# Altium PCB PCB1.PcbDoc (part 1 of 3)
Units mil, origin at the board's own origin, x right, y up, seen from the top; angles counter-clockwise.
Board outline 7110 x 5135 mil, 4 copper layers (Top Layer, Layer 1, Layer 2, Bottom Layer), stack 23.756 mil thick; 224 components, 137 nets, 658 pads, 306 vias.
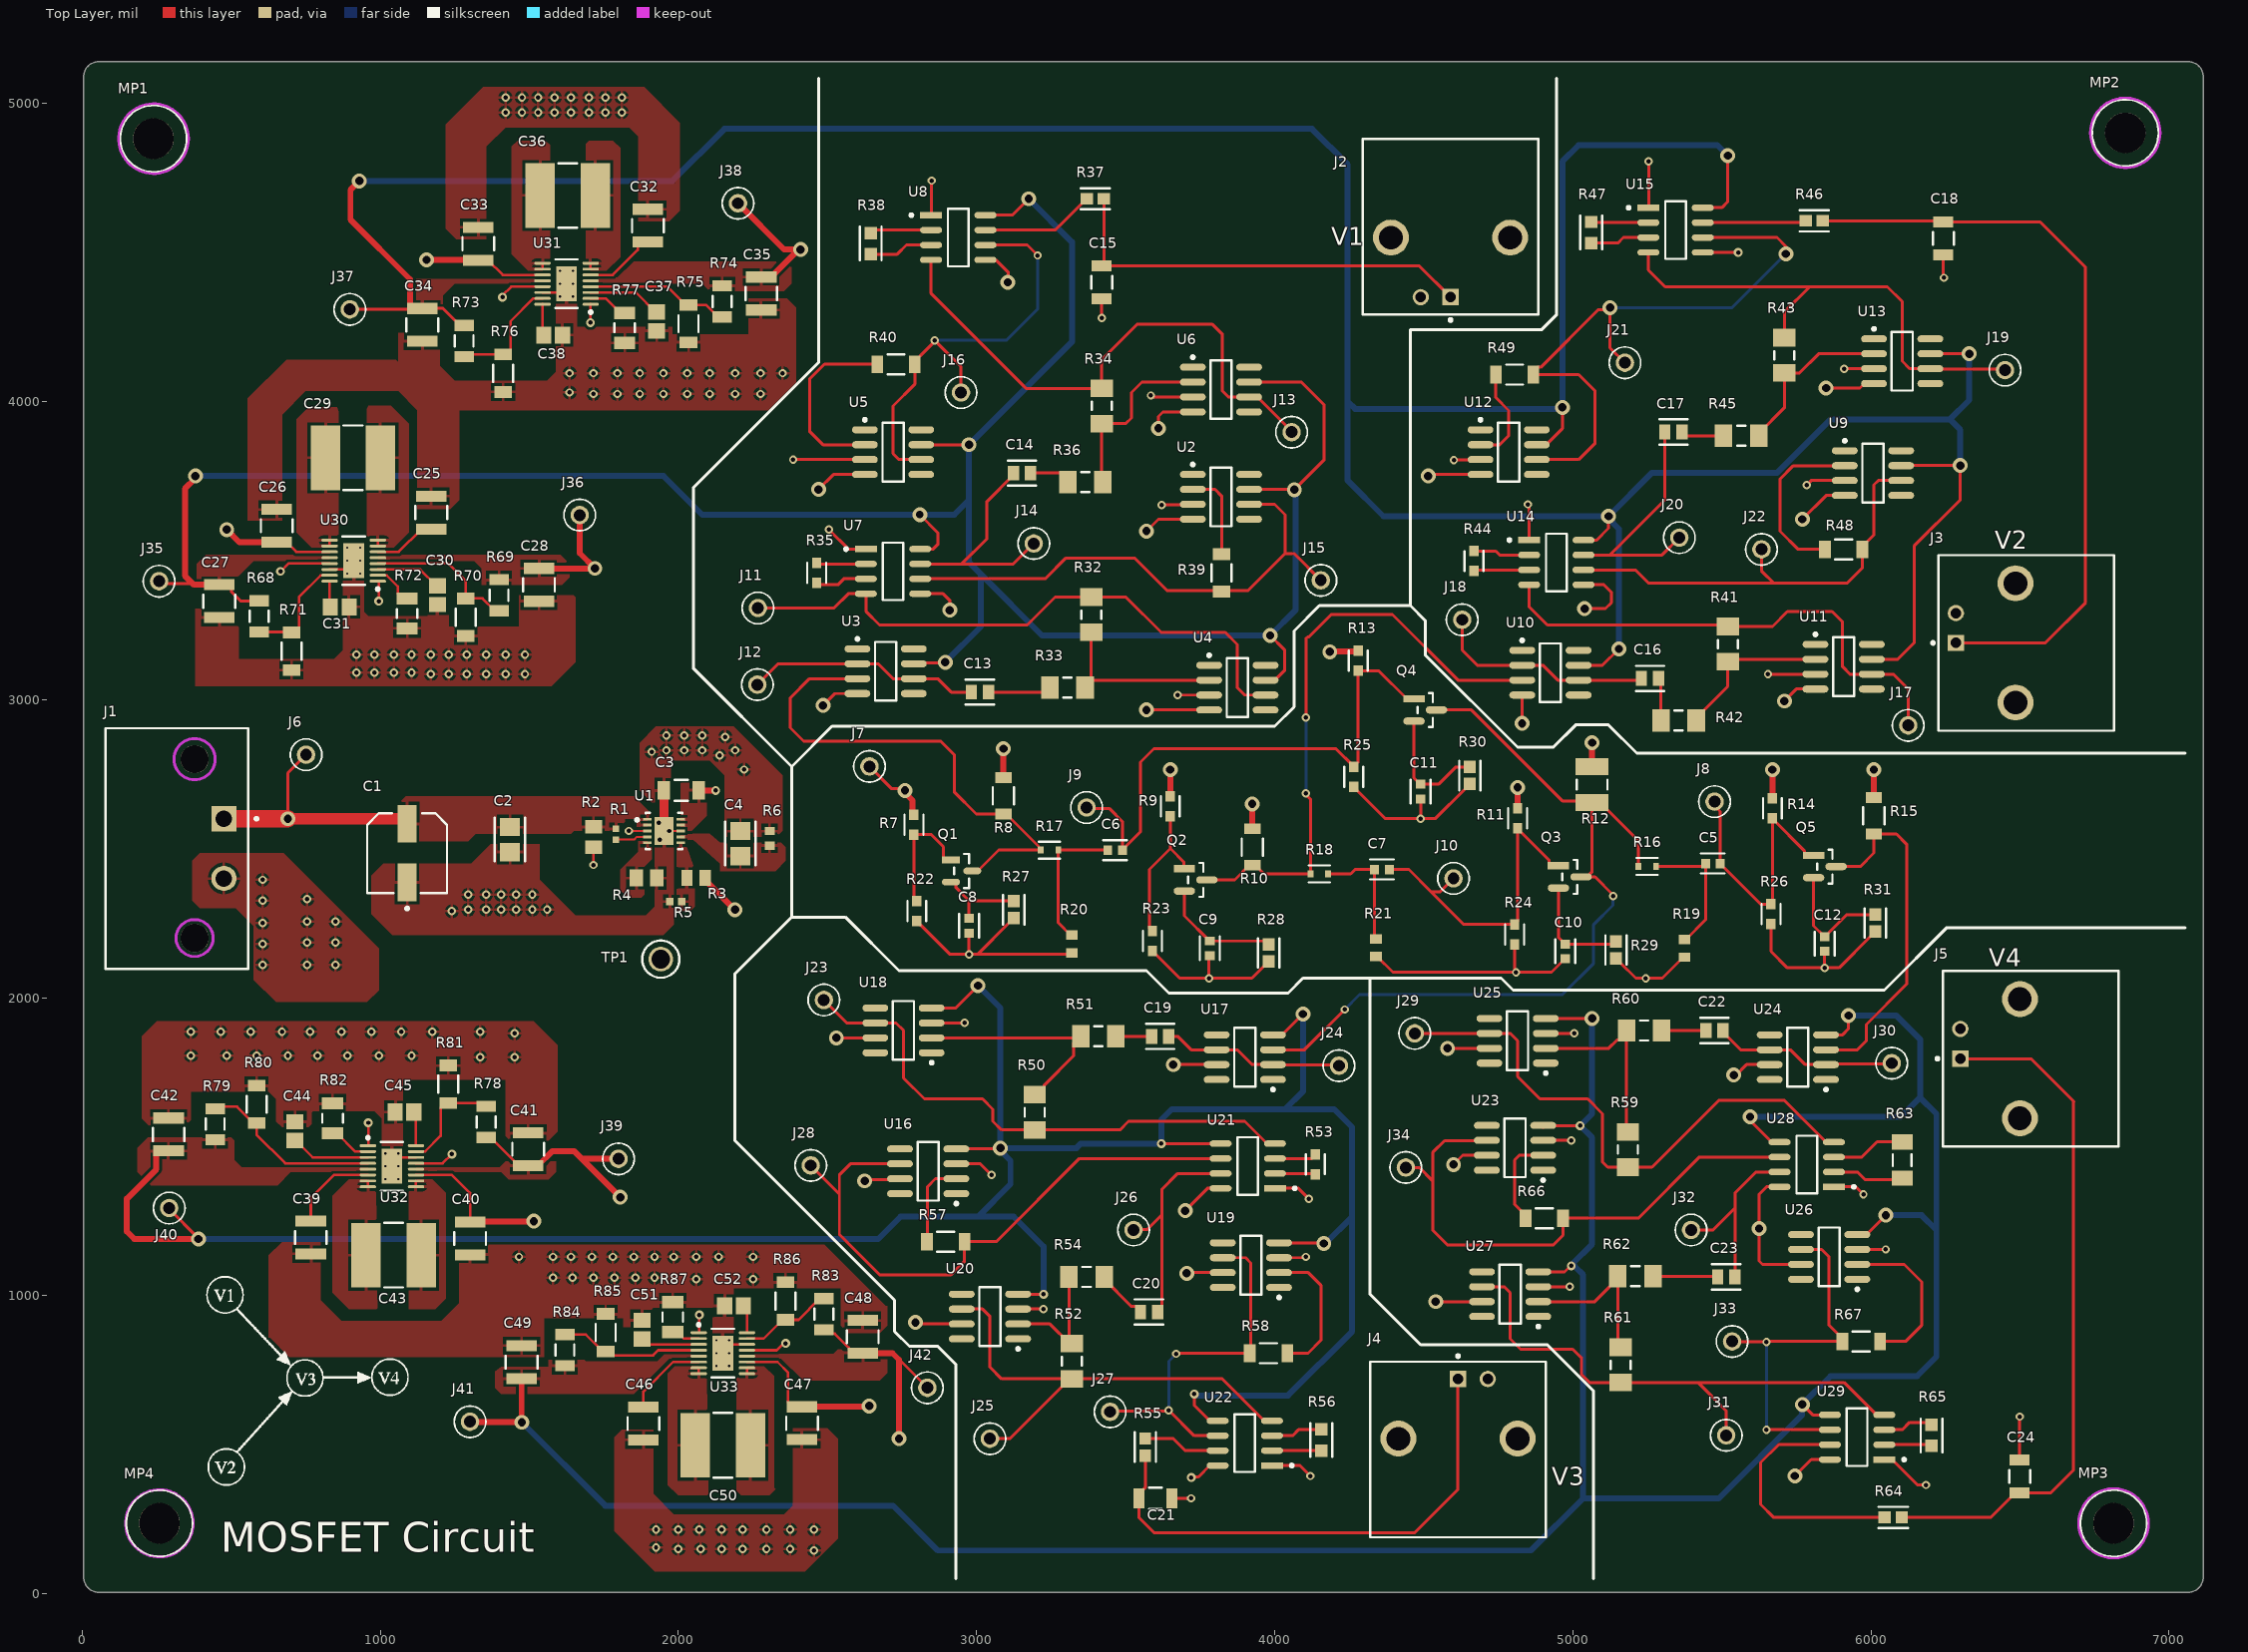
[diagram p0: Top Layer view]
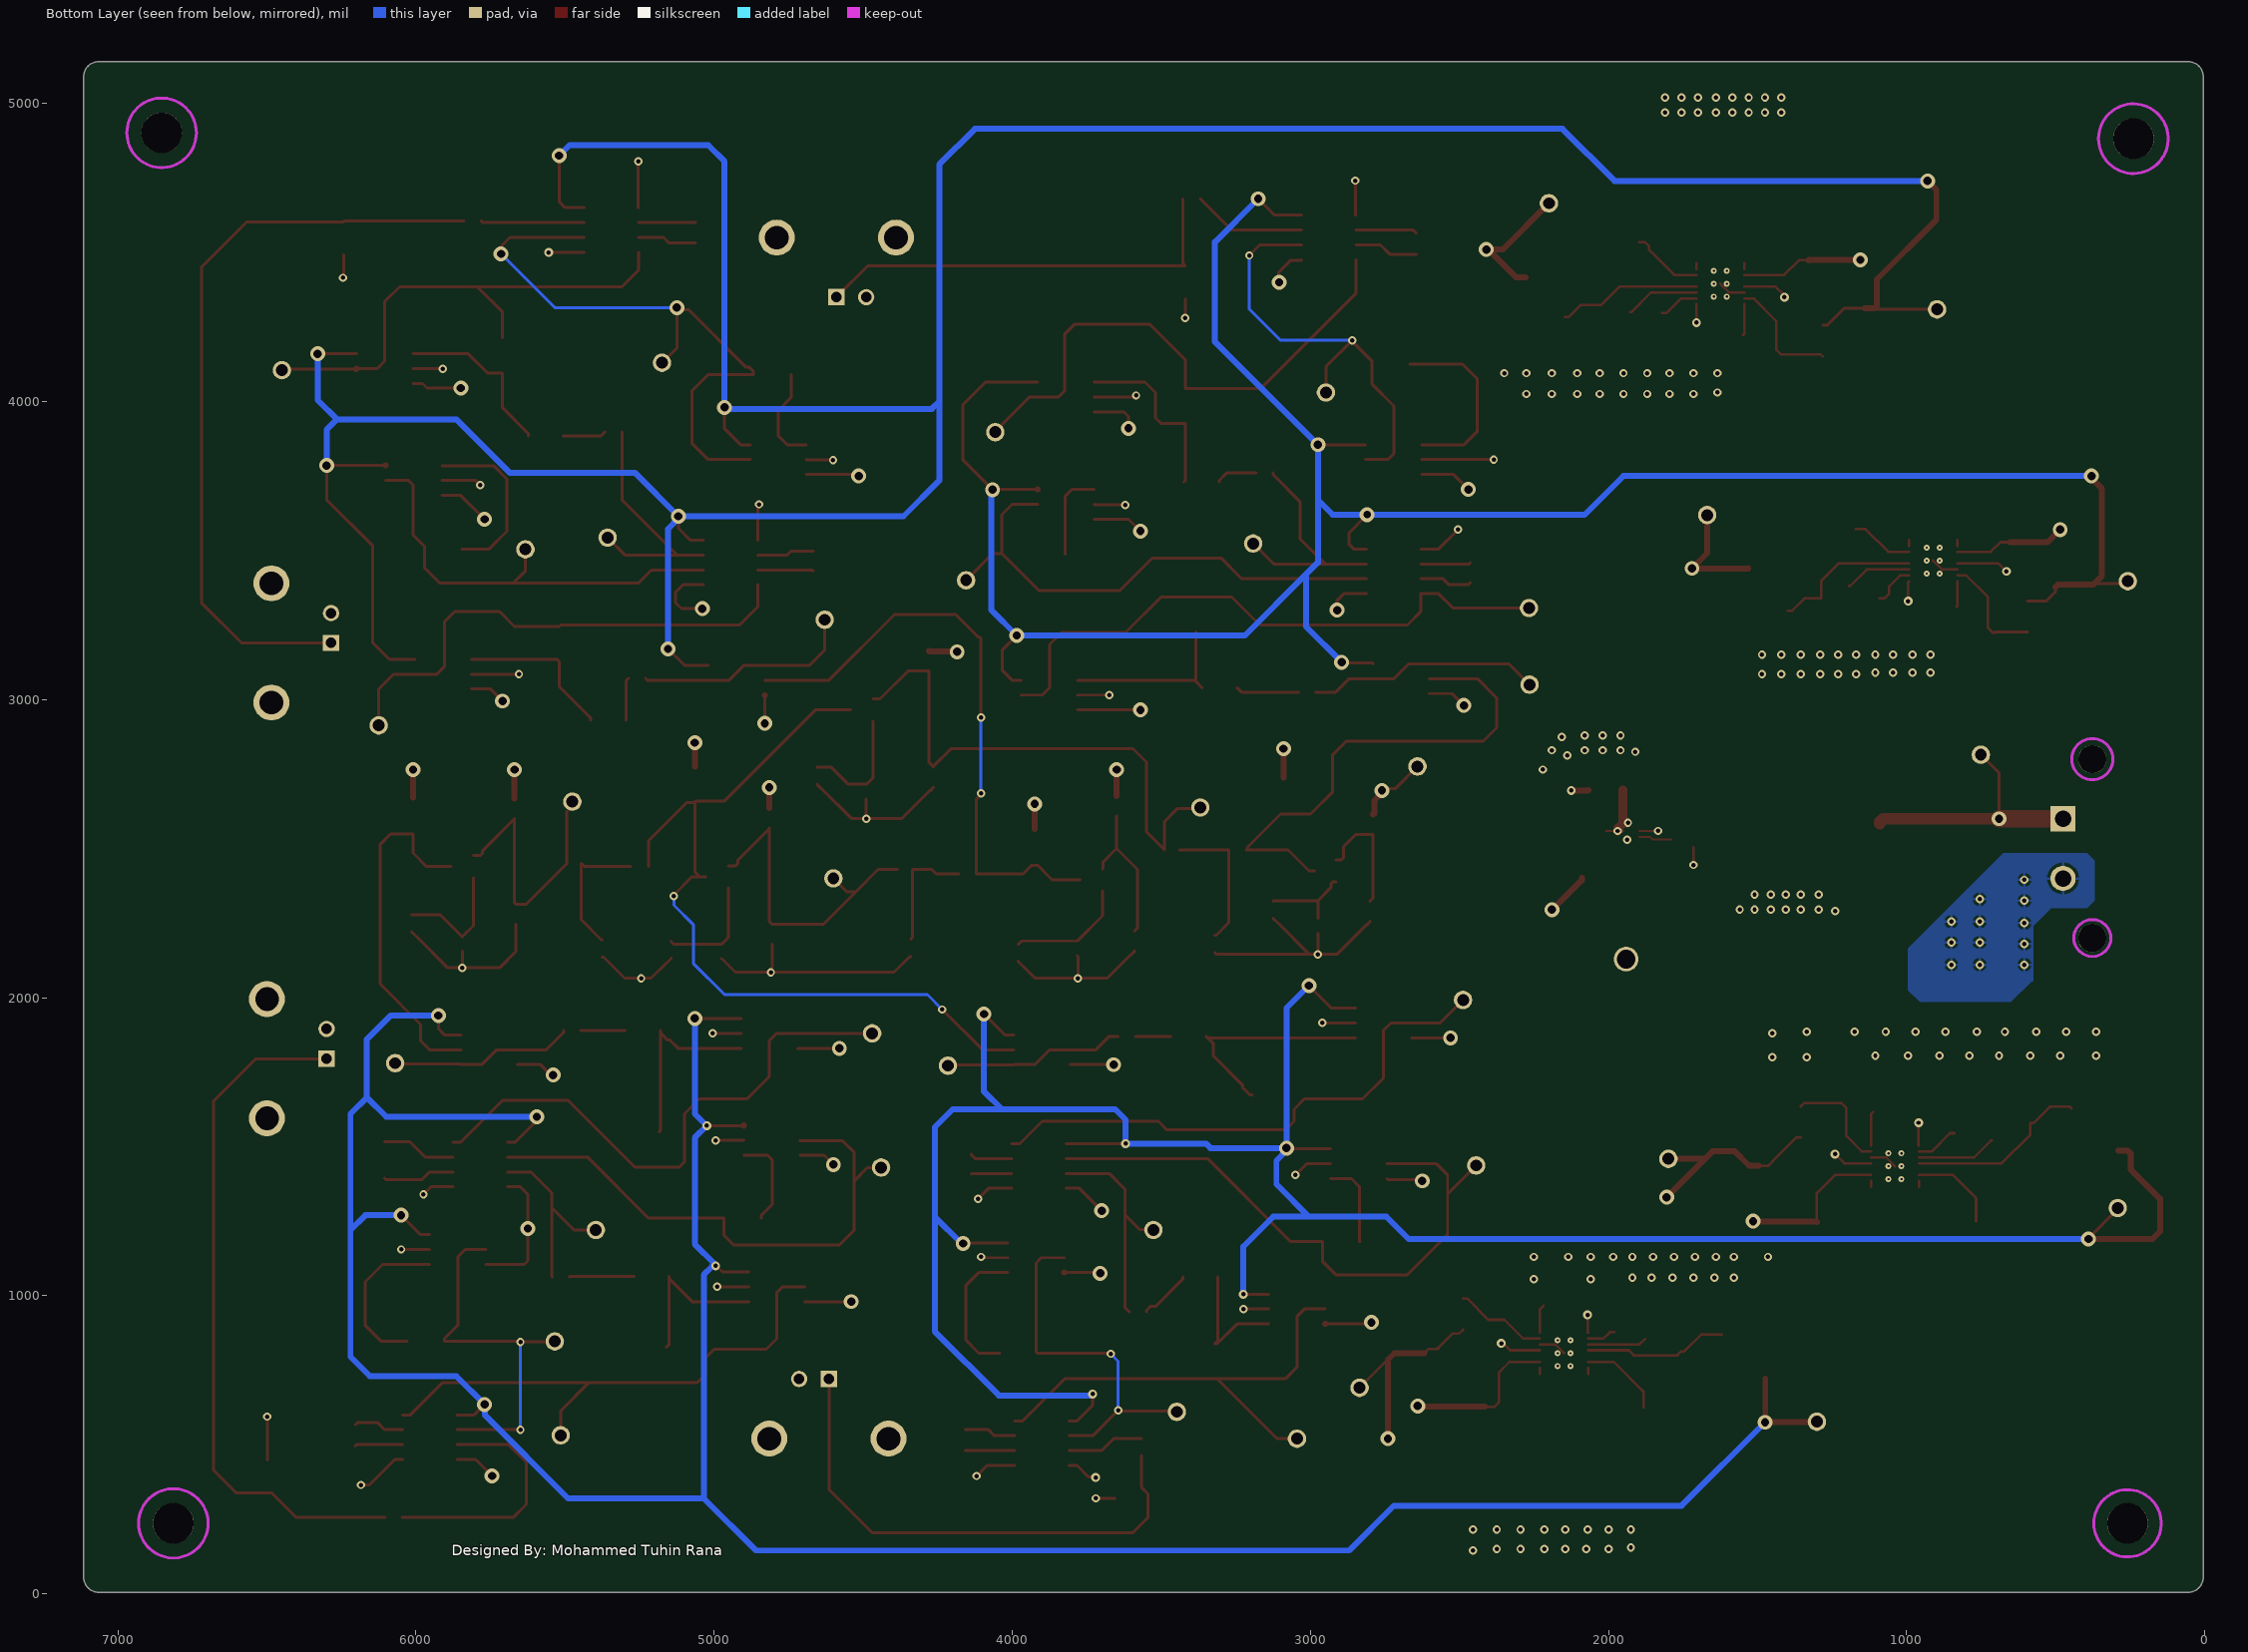
[diagram p1: Bottom Layer view, seen from below]
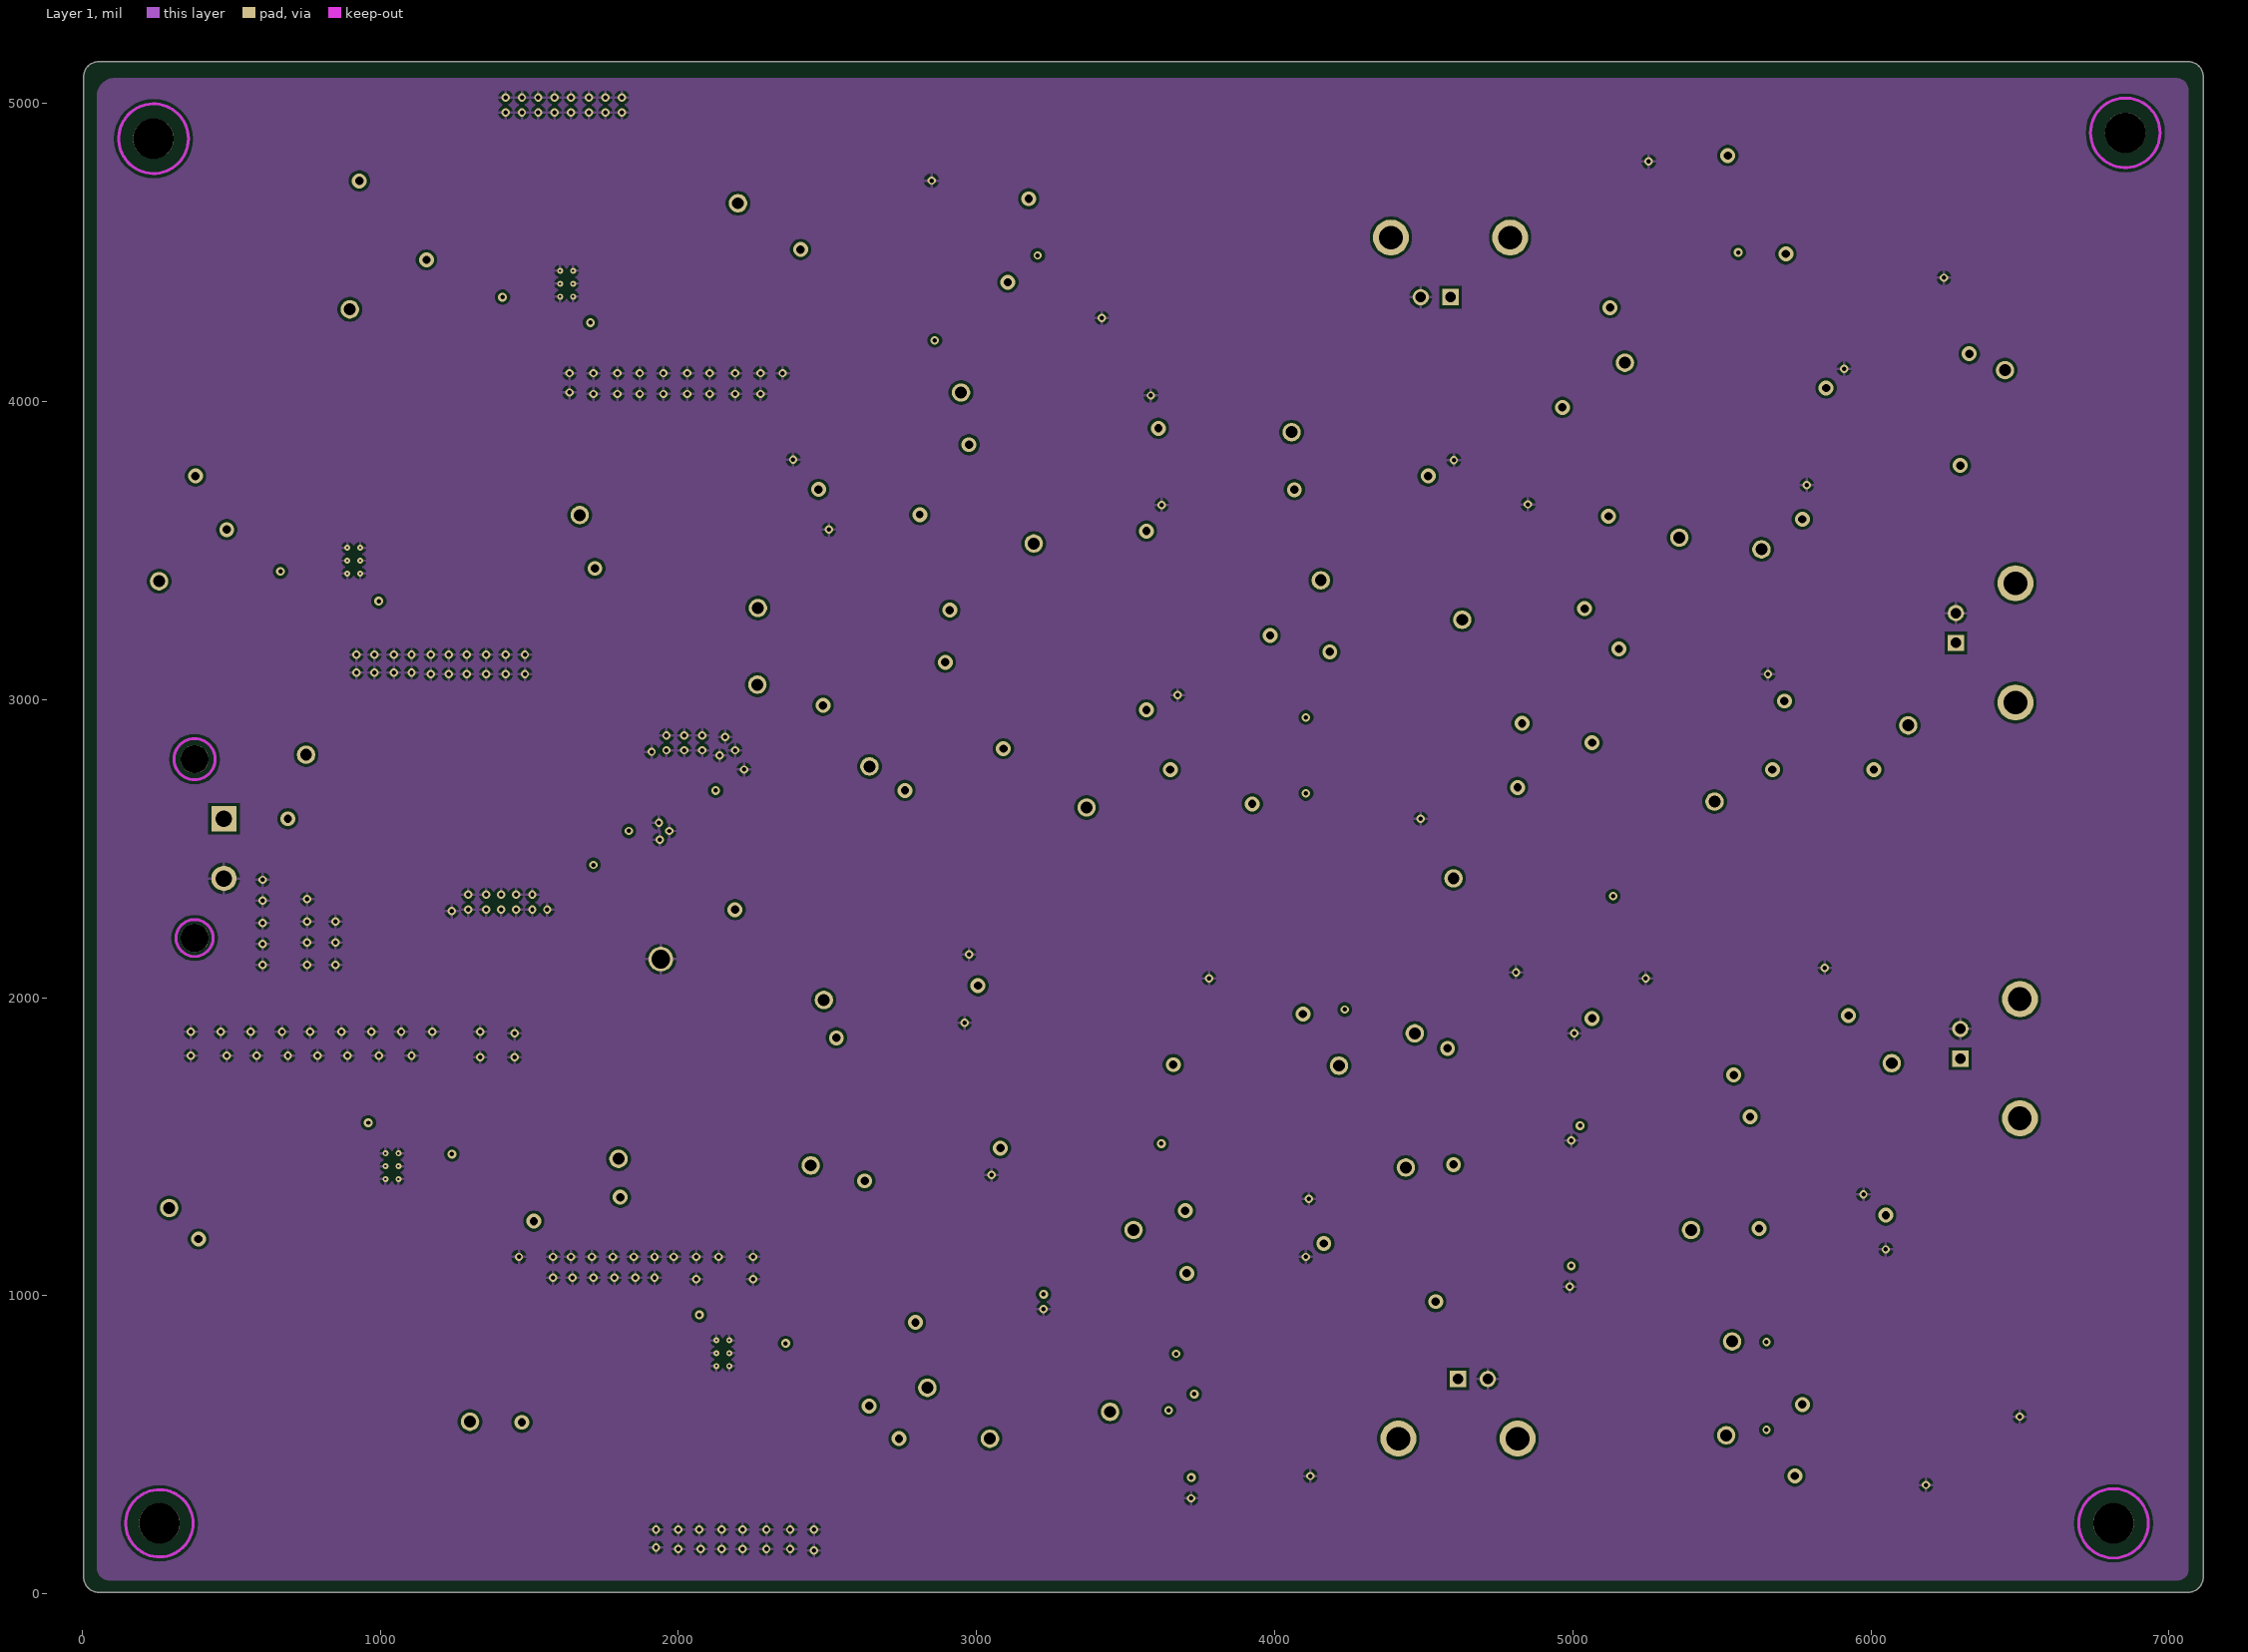
[diagram p2: Layer 1]
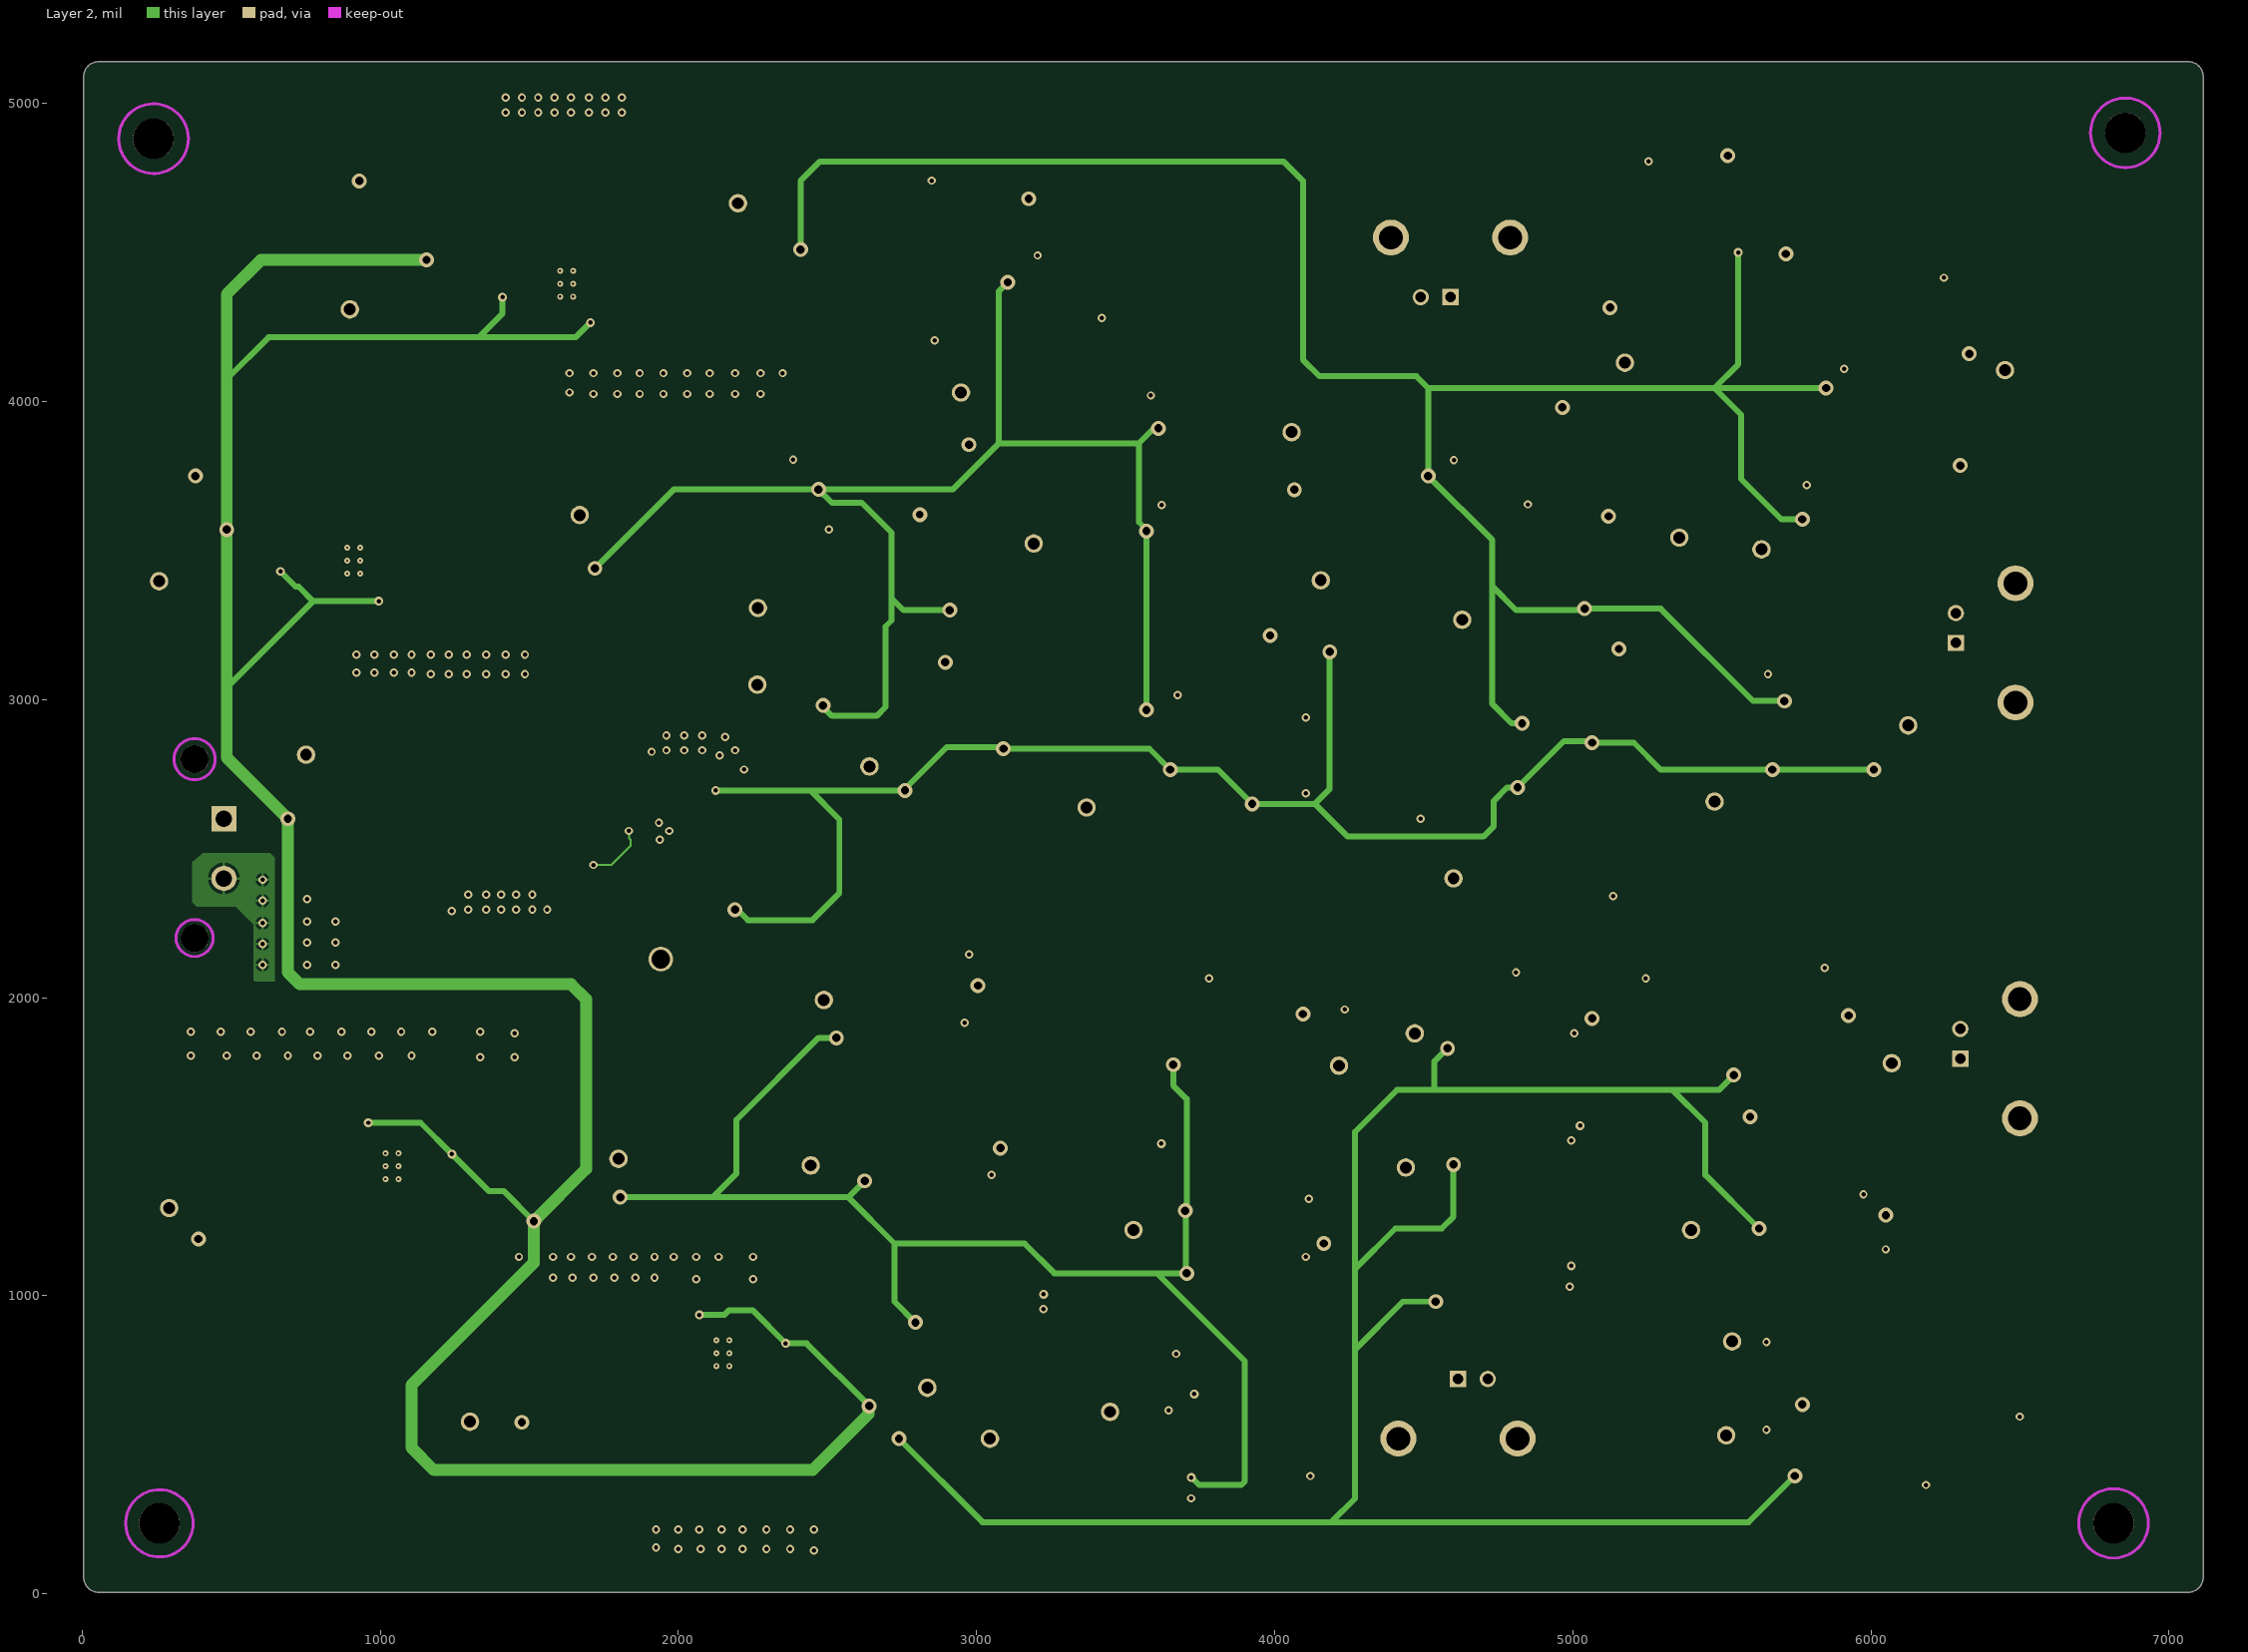
[diagram p3: Layer 2]
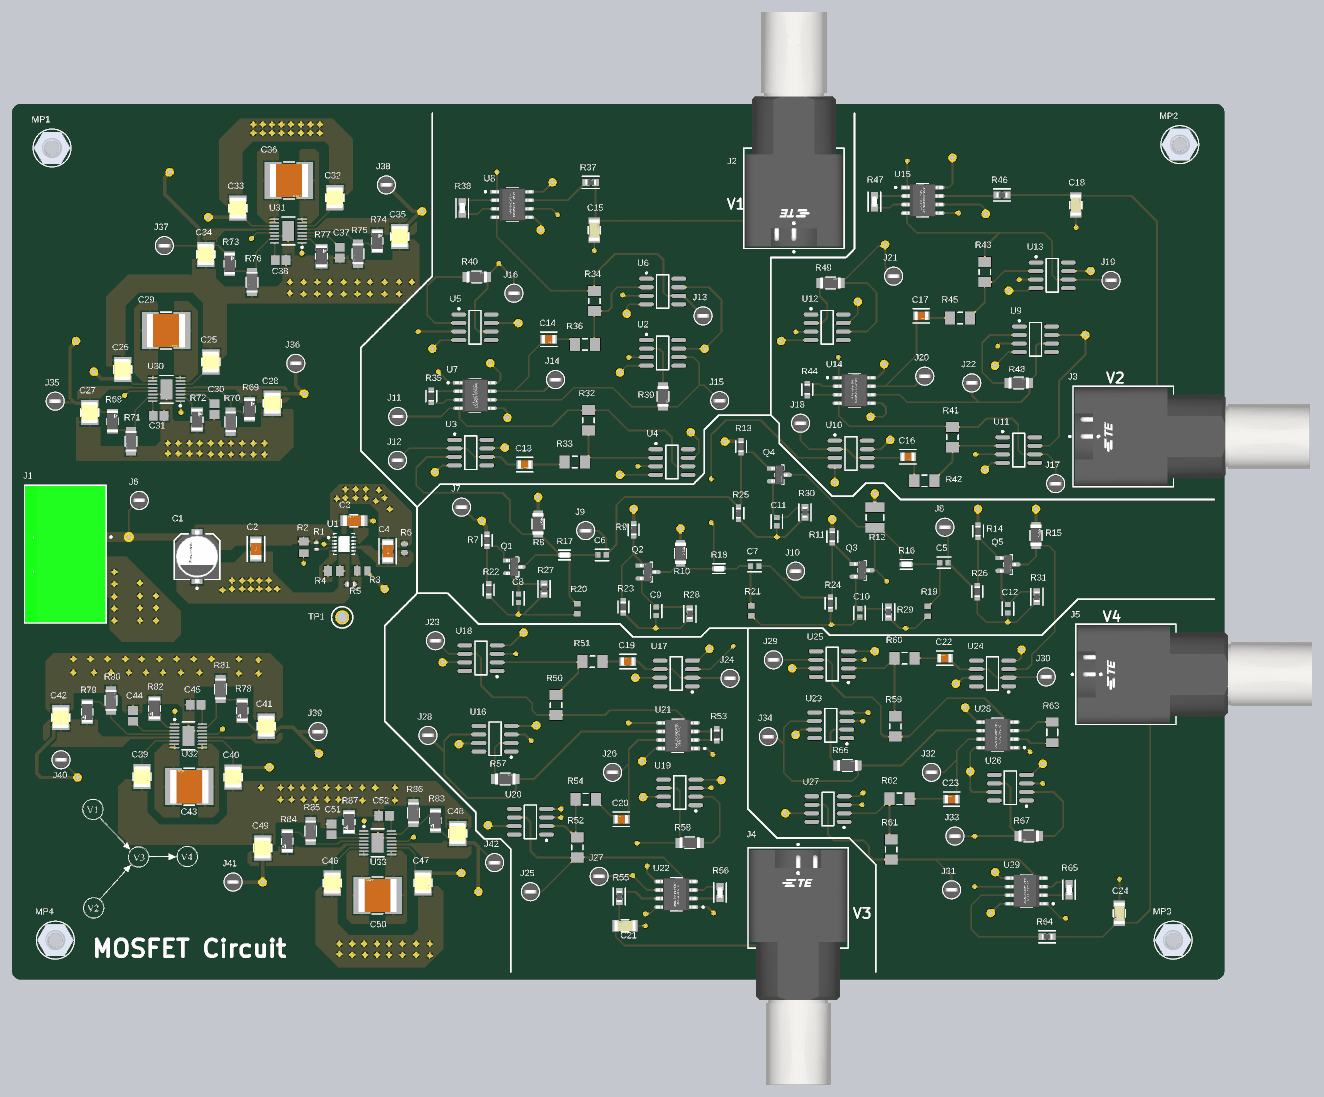
[diagram p5: 3D render of the assembled board from above, using the file's embedded part models]

## Layer stack, top to bottom
Top Solder: solder mask 0.4, Solder Resist, Dk 3.5
Top Layer: signal copper 1.4
Dielectric 2: prepreg 2.8, PP-006, Dk 4.1
Layer 1: signal copper 1.378
Dielectric 1: dielectric 12.6, FR-4, Dk 4.8
Layer 2: signal copper 1.378
Dielectric 3: prepreg 2.8, PP-006, Dk 4.1
Bottom Layer: signal copper 1.4
Bottom Solder: solder mask 0.4, Solder Resist, Dk 3.5

## Board outline
5,55 5,5090 cw(c55,5090) 55,5140 7065,5140 cw(c7065,5090) 7115,5090 7115,55 cw(c7065,55) 7065,5 55,5 cw(c55,55)

## Design rules (kind name [scope] priority, off if disabled: settings)
BoardOutlineClearance [All] p1: gap=7.87 ignorepadtopadclearanceinfootprint=FALSE except(15.75: Arc-SplitBarrior Arc-SplitContinuation Track-SplitBarrior Track-SplitContinuation SMDPad-SplitBarrior SMDPad-SplitContinuation THPad-SplitBarrior THPad-SplitContinuation Via-SplitBarrior Via-SplitContinuation Fill-SplitBarrior Fill-SplitContinuation Poly-SplitBarrior Poly-SplitContinuation Region-SplitBarrior Region-SplitContinuation Text-SplitBarrior Text-SplitContinuation)
Clearance [All] p1: gap=10 ignorepadtopadclearanceinfootprint=FALSE except(0: Arc-Hole Track-Hole SMDPad-Hole THPad-Hole Via-Hole Fill-Hole Poly-Hole Region-Hole Text-Hole; 6: SMDPad-SMDPad)
HoleSize [All] p1: absolutevalues=TRUE maxlimit=248.03 minlimit=7.87 maxpercent=80.000 minpercent=20.000
MinimumAnnularRing [All] p1: minimumring=3
MinimumSolderMaskSliver [All] p1: minsoldermaskwidth=3.94
PolygonConnect [All] p1: connectstyle=Relief reliefconductorwidth=10 reliefentries=4 polygonreliefangle="90 Angle" airgapwidth=10
RoutingVias [All] p1: holewidth=28 width=50 viastyle="Through Hole" minholewidth=7.87 minwidth=16 maxholewidth=28 maxwidth=100
SMDNeckDown [All] p1: percent=90.000
SilkToSilkClearance [All] p1: silktosilkclearance=3.94
SilkToSolderMaskClearance [IsPad] p1: minsilkscreentomaskgap=3.94 clearancetoexposedcopper=TRUE
SolderMaskExpansion [All] p1: expansion=4 istentingtop=FALSE
Width [All] p1: maxlimit=100 minlimit=5 preferedwidth=10
26 further rules are at their usual default settings.

## Components (designator, comment, footprint, x,y, rotation, side; value= is the part's Value field where it differs from the comment)
C1 "22uF/50V ALUM" FP-FKD-MFG 1090,2485 r90 top
C2 "4.7uF/35V" FP-C3216-160-0_2-IPC_C 1435,2530 r270 top
C3 "10uF/25V" FP-GRM31C-0_2-e0_3_0_8-MFG 2009.57,2695.63 r180 top
C4 "4.7uF/35V" FP-C3216-160-0_2-IPC_C 2207.84,2516.61 r90 top
C5 "1uF" FP-CL10-IPC_C 5470,2450 r0 top
C6 "1uF" FP-CL10-IPC_C 3465,2495 r0 top
C7 "1uF" FP-CL10-IPC_C 4360,2430 r0 top
C8 "1pF" FP-CL10-IPC_C 2975,2241.05 r270 top
C9 "1pF" FP-CL10-IPC_C 3782.64,2165.28 r270 top
C10 "1pF" FP-CL10-IPC_C 4975,2155 r270 top
C11 "1pF" FP-CL10-IPC_C 4490,2691.05 r270 top
C12 "1pF" FP-CL10-IPC_C 5845,2180 r270 top
C13 "10uF" FP-GRM21B-0_1-IPC_C 3011.37,3025 r0 top
C14 "10uF" FP-GRM21B-0_1-IPC_C 3152.72,3759.76 r0 top
C15 "3nF" FP-C1206C-EB-MFG 3420,4400 r270 top value="3,000 pF"
C16 "10uF" FP-GRM21B-0_1-IPC_C 5259.02,3070.79 r0 top
C17 "10uF" FP-GRM21B-0_1-IPC_C 5337.76,3897.56 r0 top
C18 "3nF" FP-C1206C-EB-MFG 6243.27,4547.16 r270 top value="3,000 pF"
C19 "10uF" FP-GRM21B-0_1-IPC_C 3616.21,1870 r180 top
C20 "10uF" FP-GRM21B-0_1-IPC_C 3578.63,945 r180 top
C21 "3nF" FP-C1206C-EB-MFG 3599.88,320 r0 top value="3,000 pF"
C22 "10uF" FP-GRM21B-0_1-IPC_C 5475.55,1889.68 r180 top
C23 "10uF" FP-GRM21B-0_1-IPC_C 5514.92,1062.91 r180 top
C24 "3nF" FP-C1206C-EB-MFG 6499.17,393.62 r90 top value="3,000 pF"
C25 "10uF" FP-C1210C106M6PACTU-MFG 1171,3627 r90 top
C26 "10uF" FP-C1210C106M6PACTU-MFG 653,3583 r90 top
C27 "10uF" FP-C1210C106M6PACTU-MFG 460,3330 r270 top
C28 "10uF" FP-C1210C106M6PACTU-MFG 1532,3385 r270 top
C29 "1uF" FP-GRM55D-0_4-IPC_A 908.46,3811 r0 top
C30 "10nF" CAPC2013X100X50NL20T25 1192,3350 r90 top
C31 "10nF" CAPC2013X100X50NL20T25 864,3311 r180 top
C32 "10uF" FP-C1210C106M6PACTU-MFG 1898,4590 r90 top
C33 "10uF" FP-C1210C106M6PACTU-MFG 1329,4529 r90 top
C34 "10uF" FP-C1210C106M6PACTU-MFG 1141,4257 r270 top
C35 "10uF" FP-C1210C106M6PACTU-MFG 2278,4362 r270 top
C36 "1uF" FP-GRM55D-0_4-IPC_A 1628.46,4691 r0 top
C37 "10nF" CAPC2013X100X50NL20T25 1927,4268.5 r90 top
C38 "10nF" CAPC2013X100X50NL20T25 1580,4223 r180 top
C39 "10uF" FP-C1210C106M6PACTU-MFG 767,1195 r270 top
C40 "10uF" FP-C1210C106M6PACTU-MFG 1301,1192 r270 top
C41 "10uF" FP-C1210C106M6PACTU-MFG 1496,1491 r90 top
C42 "10uF" FP-C1210C106M6PACTU-MFG 290,1541 r90 top
C43 "1uF" FP-GRM55D-0_4-IPC_A 1044.46,1136 r180 top
C44 "10nF" CAPC2013X100X50NL20T25 714,1552 r270 top
C45 "10nF" CAPC2013X100X50NL20T25 1081.5,1616 r0 top
C46 "10uF" FP-C1210C106M6PACTU-MFG 1883,570.88 r270 top
C47 "10uF" FP-C1210C106M6PACTU-MFG 2415,572 r270 top
C48 "10uF" FP-C1210C106M6PACTU-MFG 2618,862 r90 top
C49 "10uF" FP-C1210C106M6PACTU-MFG 1474,776.88 r90 top
C50 "1uF" FP-GRM55D-0_4-IPC_A 2149,498 r180 top
C51 "10nF" CAPC2013X100X50NL20T25 1878,886 r270 top
C52 "10nF" CAPC2013X100X50NL20T25 2186.5,966 r0 top
J1 "1776508" FP-1776508-MFG 318.07,2499.92 r270 top
J2 "BNC-a" FP-5413194-2-MFG 4590,4992.32 r0 top
J3 "BNC-b" FP-5413194-2-MFG 6927.32,3190 r270 top
J4 "BNC-c" FP-5413194-2-MFG 4615,78.07 r180 top
J5 "BNC-d" FP-5413194-2-MFG 6942.32,1795 r270 top
J6 "5001" FP-5001-MFG 751.14,2814.88 r0 top
J7 "5001" FP-5001-MFG 2640.91,2775.51 r0 top
J8 "5001" FP-5001-MFG 5475.55,2657.4 r0 top
J9 "5001" FP-5001-MFG 3369.25,2637.72 r0 top
J10 "5001" FP-5001-MFG 4600,2400 r0 top
J11 "5001" FP-5001-MFG 2266.89,3307.01 r0 top
J12 "5001" FP-5001-MFG 2265,3050 r0 top
J13 "5001" FP-5001-MFG 4057,3897 r0 top
J14 "5001" FP-5001-MFG 3192.09,3523.54 r0 top
J15 "5001" FP-5001-MFG 4155,3400 r0 top
J16 "5001" FP-5001-MFG 2948,4030 r0 top
J17 "5001" FP-5001-MFG 6125.16,2913.31 r0 top
J18 "5001" FP-5001-MFG 4629.1,3267.64 r0 top
J19 "5001" FP-5001-MFG 6450,4105 r0 top
J20 "5001" FP-5001-MFG 5357.44,3543.23 r0 top
J21 "5001" FP-5001-MFG 5175,4130 r0 top
J22 "5001" FP-5001-MFG 5633.03,3503.86 r0 top
J23 "5001" FP-5001-MFG 2488,1992 r0 top
J24 "5001" FP-5001-MFG 4215.71,1771.57 r0 top
J25 "5001" FP-5001-MFG 3045,520 r0 top
J26 "5001" FP-5001-MFG 3526.73,1220.39 r0 top
J27 "5001" FP-5001-MFG 3447.99,610.16 r0 top
J28 "5001" FP-5001-MFG 2444.05,1436.93 r0 top
J29 "5001" FP-5001-MFG 4470,1880 r0 top
J30 "5001" FP-5001-MFG 6070,1780 r0 top
J31 "5001" FP-5001-MFG 5514.92,531.42 r0 top
J32 "5001" FP-5001-MFG 5396.81,1220.39 r0 top
J33 "5001" FP-5001-MFG 5534.61,846.38 r0 top
J34 "5001" FP-5001-MFG 4440,1430 r0 top
J35 "5001" FP-5001-MFG 258,3397 r0 top
J36 "5001" FP-5001-MFG 1669,3619 r0 top
J37 "5001" FP-5001-MFG 898,4309 r0 top
J38 "5001" FP-5001-MFG 2200,4665 r0 top
J39 "5001" FP-5001-MFG 1799,1459 r0 top
J40 "5001" FP-5001-MFG 292,1294 r0 top
J41 "5001" FP-5001-MFG 1301,577 r0 top
J42 "5001" FP-5001-MFG 2835,691 r0 top
MP1 "Hex Standoff" FP-2056-440-AL-MFG 239.33,4881.81 r0 top
MP2 "Hex Standoff" FP-2056-440-AL-MFG 6853.5,4901.5 r0 top
MP3 "Hex Standoff" FP-2056-440-AL-MFG 6814.13,236.14 r0 top
MP4 "Hex Standoff" FP-2056-440-AL-MFG 259.02,236.14 r0 top
Q1 "BJT" FP-318-08-IPC_B 2950,2425 r0 top
Q2 "BJT" FP-318-08-IPC_A 3735,2395 r0 top
Q3 "BJT" FP-318-08-IPC_A 4990,2405 r0 top
Q4 "BJT" FP-318-08-IPC_A 4505,2965 r0 top
Q5 "BJT" FP-318-08-IPC_A 5845.49,2439.68 r0 top
R1 "200K" RESC1005X40X25NL05T05 1790,2548 r90 top
R2 "0" RESC2013X70X40NL20T20 1715.71,2539.29 r90 top
R3 "453k" RESC2013X70X40LL20T20 2059.21,2401.5 r0 top
R4 "249" RESC2013X70X40NL20T20 1892.87,2401.5 r180 top
R5 "12k" RESC1005X40X25ML05T05 1991.3,2322.76 r0 top
R6 "121k" RESC1608X55X30LL15T15 2306.26,2534.37 r270 top
R7 "100K" FP-RT0603-0_55-MFG 2790,2580 r90 top
R8 "22K" FP-RN73R2B-MFG 3090,2677.01 r90 top
R9 "100K" FP-RT0603-0_55-MFG 3650,2642.01 r90 top
R10 "22K" FP-RN73R2B-MFG 3925,2505 r90 top
R11 "100K" FP-RT0603-0_55-MFG 4815,2602.01 r90 top
R12 "11K" RESC3225X70X50ML20T20 5065,2715 r90 top
R13 "100K" FP-RT0603-0_55-MFG 4280,3130 r90 top
R14 "100K" FP-RT0603-0_55-MFG 5670,2635 r90 top
R15 "22K" FP-RN73R2B-MFG 6010,2610 r90 top
R16 "22K" FP-RN73R1J-MFG 5250,2440 r0 top
R17 "22K" FP-RN73R1J-MFG 3245,2495 r0 top
R18 "22K" FP-RN73R1J-MFG 4150,2415 r0 top
R19 "22K" RESC1608X55X25ML10T15 5375,2165 r90 top
R20 "22K" RESC1608X55X25ML10T15 3320,2180 r90 top
R21 "22K" RESC1608X55X25ML10T15 4340,2167.01 r90 top
R22 "22K" FP-RT0603-0_55-MFG 2800,2290 r90 top
R23 "22K" FP-RT0603-0_55-MFG 3590,2190 r90 top
R24 "22K" FP-RT0603-0_55-MFG 4805,2212.01 r90 top
R25 "22K" FP-RT0603-0_55-MFG 4265,2740 r90 top
R26 "22K" FP-RT0603-0_55-MFG 5665,2280 r90 top
R27 "4.7K" FP-ERA3A-IPC_B 3125,2295 r90 top
R28 "4.7K" FP-ERA3A-IPC_B 3980,2150 r90 top
R29 "4.7K" FP-ERA3A-IPC_B 5145,2160 r90 top
R30 "4.7K" FP-ERA3A-IPC_B 4655,2745 r90 top
R31 "4.7K" FP-ERA3A-IPC_B 6015,2250 r90 top
R32 "1K" RESC3216X70X50ML20T25 3385,3285 r90 top
R33 "1K" RESC3216X70X50ML20T25 3305,3040 r0 top
R34 "1K" RESC3216X70X50ML20T25 3420,3985 r90 top
R35 "4R99" FP-RT0603-MFG 2463.74,3425.12 r90 top value=10Ω
R36 "1K" RESC3216X70X50ML20T25 3365,3730 r0 top
R37 "100" FP-ERA3A-IPC_B 3398.57,4680 r0 top
R38 "10K" FP-ERJPA3-IPC_A 2645,4529.55 r90 top
R39 "5K" FP-RT1206-0_65-MFG 3822.01,3425.12 r270 top value=5kΩ
R40 "5K" FP-RT1206-0_65-MFG 2730,4125 r0 top value=5kΩ
R41 "1K" RESC3216X70X50ML20T25 5520,3185.95 r90 top
R42 "1K" RESC3216X70X50ML20T25 5355,2930 r0 top
R43 "1K" RESC3216X70X50ML20T25 5710,4155 r90 top
R44 "4R99" FP-RT0603-MFG 4668.47,3464.49 r90 top value=10Ω
R45 "1K" RESC3216X70X50ML20T25 5565,3885 r0 top
R46 "100" FP-ERA3A-IPC_B 5810.2,4606.22 r0 top
R47 "10K" FP-ERJPA3-IPC_A 5062.16,4566.85 r90 top
R48 "5K" FP-RT1206-0_65-MFG 5908.62,3503.86 r0 top value=5kΩ
R49 "5K" FP-RT1206-0_65-MFG 4805,4090 r0 top value=5kΩ
R50 "1K" RESC3216X70X50ML20T25 3195,1615 r270 top
R51 "1K" RESC3216X70X50ML20T25 3408.62,1870 r180 top
R52 "1K" RESC3216X70X50ML20T25 3320,780 r270 top
R53 "4R99" FP-RT0603-MFG 4136.97,1440.86 r270 top value=10Ω
R54 "1K" RESC3216X70X50ML20T25 3369.25,1062.91 r180 top
R55 "100" FP-ERA3A-IPC_B 3566.1,492.05 r270 top
R56 "10K" FP-ERJPA3-IPC_A 4156.65,515.65 r270 top
R57 "5K" FP-RT1206-0_65-MFG 2896.81,1181.02 r0 top value=5kΩ
R58 "5K" FP-RT1206-0_65-MFG 3979.49,807.01 r180 top value=5kΩ
R59 "1K" RESC3216X70X50ML20T25 5185,1490 r270 top
R60 "1K" RESC3216X70X50ML20T25 5239.33,1889.68 r180 top
R61 "1K" RESC3216X70X50ML20T25 5160.59,767.64 r270 top
R62 "1K" RESC3216X70X50ML20T25 5210,1065 r180 top
R63 "20" RESC3216X60X45ML10T20 6105,1455 r270 top
R64 "100" FP-ERA3A-IPC_B 6074.98,255.83 r0 top
R65 "10K" FP-ERJPA3-IPC_A 6203.9,531.42 r270 top
R66 "5K" FP-RT1206-0_65-MFG 4904.69,1259.76 r0 top value=5kΩ
R67 "5K" FP-RT1206-0_65-MFG 5967.68,846.38 r180 top value=5kΩ
R68 "909K" FP-CRCW1206-e3-IPC_C 594,3279 r90 top
R69 "909K" FP-CRCW1206-e3-IPC_C 1398,3350 r90 top
R70 "100K" FP-AC1206-MFG 1287,3276 r270 top value=100KΩ
R71 "100K" FP-AC1206-MFG 702,3162 r270 top value=100KΩ
R72 "200K" FP-CRCW1206-e3-MFG 1090,3288.8 r90 top
R73 "909K" FP-CRCW1206-e3-IPC_C 1281,4203 r90 top
R74 "909K" FP-CRCW1206-e3-IPC_C 2147,4336 r90 top
R75 "100K" FP-AC1206-MFG 2034,4261 r270 top value=100KΩ
R76 "100K" FP-AC1206-MFG 1412,4095 r270 top value=100KΩ
R77 "200K" FP-CRCW1206-e3-MFG 1820,4247 r90 top
R78 "909K" FP-CRCW1206-e3-IPC_C 1355,1583 r270 top
R79 "909K" FP-CRCW1206-e3-IPC_C 446,1575 r270 top
R80 "100K" FP-AC1206-MFG 585,1642 r90 top value=100KΩ
R81 "100K" FP-AC1206-MFG 1228,1709 r90 top value=100KΩ
R82 "200K" FP-CRCW1206-e3-MFG 840,1595 r270 top
R83 "909K" FP-CRCW1206-e3-IPC_C 2488,938 r270 top
R84 "909K" FP-CRCW1206-e3-IPC_C 1619,817 r270 top
R85 "100K" FP-AC1206-MFG 1756,876 r90 top value=100KΩ
R86 "100K" FP-AC1206-MFG 2359,982 r90 top value=100KΩ
R87 "200K" FP-CRCW1206-e3-MFG 1981,928 r270 top
TP1 "5012" KSTN-5012_V 1941,2129 r0 top
U1 "LT3045" FP-LT3045EDD#PBF-MFG 1951.93,2558.98 r0 top
U2 "OP1177" ADI-R-8_N 3820,3680 r0 top
U3 "LT6202" LT-S8-8_N 2695,3095 r0 top
U4 "LT6202" LT-S8-8_N 3875,3040 r0 top
U5 "OP1177" ADI-R-8_N 2720,3830 r0 top
U6 "LT6202" LT-S8-8_N 3820,4040 r0 top
U7 "AD8421" FP-R-8-IPC_C 2720,3430 r0 top
U8 "AD8421" FP-R-8-IPC_C 2938.82,4550 r0 top
U9 "OP1177" ADI-R-8_N 6007.05,3759.76 r0 top
U10 "LT6202" LT-S8-8_N 4925,3090 r0 top
U11 "LT6202" LT-S8-8_N 5908.62,3110.16 r0 top
U12 "OP1177" ADI-R-8_N 4785,3830 r0 top
U13 "LT6202" LT-S8-8_N 6105,4135 r0 top
U14 "AD8421" FP-R-8-IPC_C 4945,3460 r0 top
U15 "AD8421" FP-R-8-IPC_C 5345,4575 r0 top
U16 "OP1177" ADI-R-8_N 2837.76,1417.24 r180 top
U17 "LT6202" LT-S8-8_N 3900,1800 r180 top
U18 "LT6202" LT-S8-8_N 2755,1890 r180 top
U19 "OP1177" ADI-R-8_N 3920.43,1102.28 r180 top
U20 "LT6202" LT-S8-8_N 3045,930 r180 top
U21 "AD8421" FP-R-8-IPC_C 3910,1435 r180 top
U22 "AD8421" FP-R-8-IPC_C 3900,505 r180 top
U23 "OP1177" ADI-R-8_N 4806.26,1495.98 r180 top
U24 "LT6202" LT-S8-8_N 5755,1800 r180 top
U25 "LT6202" LT-S8-8_N 4815,1855 r180 top
U26 "OP1177" ADI-R-8_N 5860,1130 r180 top
U27 "LT6202" LT-S8-8_N 4790,1005 r180 top
U28 "AD8421" FP-R-8-IPC_C 5785,1440 r180 top
U29 "AD8421" FP-R-8-IPC_C 5953.82,525 r180 top
U30 "LTC3260" LT-MSE-16-EDP_L 911,3466 r180 top
U31 "LTC3260" LT-MSE-16-EDP_L 1625,4395 r180 top
U32 "LTC3260" LT-MSE-16-EDP_L 1039.29,1434.21 r0 top
U33 "LTC3260" LT-MSE-16-EDP_L 2149,807 r0 top

## Footprints (in the part's own frame and the unit in brackets; to place one, negate y for a bottom-side part, rotate by r counter-clockwise, add the part's x,y. Pads: shape width x height; smd on the part's side, far side on the other; paste and mask are expansions set on the pad)
ADI-R-8_N [mm] "SOIC, 8-Leads, Body 4.9x3.9mm, Pitch 1.27mm, IPC Medium Density"
  oval 2.2x0.6 smd: 1(-2.4,1.905) 2(-2.4,0.635) 3(-2.4,-0.635) 4(-2.4,-1.905) 5(2.4,-1.905) 6(2.4,-0.635) 7(2.4,0.635) 8(2.4,1.905)
  silkscreen extent -2.52,-2.5 0.9,2.88, body extent -2,-2.5 2,2.5, height 1.75
CAPC2013X100X50NL20T25 [mm] "Chip Capacitor, 2-Leads, Body 2.00x1.25mm, IPC Medium Density"
  rect 1.3x1.45 smd mask+0.051: 1(-0.8,0) 2(0.8,0)
  body extent -1.1,-0.72 1.1,0.72, height 1
FP-318-08-IPC_A [mm]
  rect 1.824x0.618 smd paste+0 mask+0: 1(-0.96,0.95)
  rrect100% 1.824x0.618 smd paste+0 mask+0: 2(-0.96,-0.95) 3(0.96,0)
  silkscreen extent -0.65,-1.45 0.65,1.45, body extent -2.37,-1.95 2.37,1.95, height 0.25
FP-318-08-IPC_B [mm]
  rect 1.524x0.578 smd paste+0 mask+0: 1(-0.91,0.95)
  rrect100% 1.524x0.578 smd paste+0 mask+0: 2(-0.91,-0.95) 3(0.91,0)
  silkscreen extent -0.65,-1.45 0.65,1.45, body extent -1.92,-1.7 1.92,1.7, height 0.25
FP-2056-440-AL-MFG [mil]
  round 136 hole 136 unplated paste-99999 mask+0: ""(0,0)
  silkscreen extent -111,-111 111,111, body extent -115,-115 115,115, height 10
FP-5001-MFG [mm]
  round 1.57 hole 1.016 paste-2539.97 mask+0: 1(0,0)
  silkscreen extent -1.35,-1.34 1.35,1.34, body extent -1.45,-1.45 1.45,1.45, height 0.25
FP-1776508-MFG [mm]
  rect 2.15x2.15 hole 1.4 paste-2539.97 mask+0: 1(-2.54,4)
  round 2.15 hole 1.4 paste-2539.97 mask+0: 2(2.54,4)
  round 2.4 hole 2.4 unplated paste-2539.97 mask+0: ""(-7.62,1.5) ""(7.62,1.5)
  silkscreen extent -10.26,-6.07 10.26,6.9, body extent -10.36,-6.17 10.36,6.17, height 0.25
FP-5413194-2-MFG [mm]
  rect 1.39x1.39 hole 0.89 paste-2539.97 mask+0: 1(0,-16.315)
  round 1.39 hole 0.89 paste-2539.97 mask+0: 2(-2.54,-16.315)
  round 3.06 hole 2.01 paste-2539.97 mask+0: 3(-5.08,-11.235) 4(5.08,-11.235)
  silkscreen extent -7.48,-18.39 7.48,-2.83, body extent -7.58,-17.89 7.58,17.89, height 0.25
FP-AC1206-MFG [mm]
  rect 1x1.5 smd paste+0 mask+0: 1(-1.6,0) 2(1.6,0)
  silkscreen extent -0.72,-0.85 0.72,0.85, body extent -2.2,-0.95 2.2,0.95, height 0.25
FP-C1206C-EB-MFG [mm]
  rect 0.95x1.7 smd paste+0 mask+0: 1(-1.4,0) 2(1.4,0)
  silkscreen extent -0.55,-0.9 0.55,0.9, body extent -2,-1 2,1, height 0.25
FP-C1210C106M6PACTU-MFG [mm]
  rect 0.95x2.6 smd paste+0 mask+0: 1(-1.4,0) 2(1.4,0)
  silkscreen extent -0.55,-1.35 0.55,1.35, body extent -1.97,-1.45 1.97,1.45, height 0.25
FP-C3216-160-0_2-IPC_C [mil]
  rect 61.18x67.17 smd paste+0 mask+0: 1(-42.37,0) 2(42.37,0)
  silkscreen extent -73,-51 73,51, body extent -77,-39 77,39, height 10
FP-CL10-IPC_C [mil]
  rect 29.85x31.97 smd paste+0 mask+0: 1(-24.68,0) 2(24.68,0)
  silkscreen extent -40,-33 40,33, body extent -44,-22 44,22, height 10
FP-CRCW1206-e3-IPC_C [mil]
  rect 37.64x65.28 smd paste+0 mask+0: 1(-52.21,0) 2(52.21,0)
  silkscreen extent -19,-31 19,31, body extent -75,-38 75,38, height 10
FP-CRCW1206-e3-MFG [mm]
  rect 1.05x1.8 smd paste+0 mask+0: 1(-1.275,0) 2(1.275,0)
  silkscreen extent -0.38,-0.87 0.38,0.87, body extent -1.9,-1 1.9,1, height 0.25
FP-ERA3A-IPC_B [mil]
  rect 41.53x39.61 smd paste+0 mask+0: 1(-28.57,0) 2(28.57,0)
  silkscreen extent -49,-36 49,36, body extent -59,-30 59,30, height 10
FP-ERJPA3-IPC_A [mil]
  rect 41.62x41.82 smd paste+0 mask+0: 1(-35.45,0) 2(35.45,0)
  silkscreen extent -56,-37 56,37, body extent -76,-41 76,41, height 10
FP-FKD-MFG [mm]
  rect 3.2x1.6 smd paste+0 mask+0: 1(-2.5,0) 2(2.5,0)
  silkscreen extent -4.85,-3.4 3.4,3.4, body extent -4.35,-3.65 4.35,3.65, height 0.25
FP-GRM21B-0_1-IPC_C [mil]
  rect 37.71x49.69 smd paste+0 mask+0: 1(-28.63,0) 2(28.63,0)
  silkscreen extent -47,-42 47,42, body extent -51,-31 51,31, height 10
FP-GRM31C-0_2-e0_3_0_8-MFG [mm]
  rect 1.05x1.6 smd paste+0 mask+0: 1(-1.475,0) 2(1.475,0)
  silkscreen extent -0.58,-0.9 0.58,0.9, body extent -2.1,-1 2.1,1, height 0.25
FP-GRM55D-0_4-IPC_A [mil]
  rect 98.51x216.66 smd paste+0 mask+0: 1(-92.54,0) 2(92.54,0)
  silkscreen extent -31,-108 31,108, body extent -161,-128 161,128, height 10
FP-LT3045EDD#PBF-MFG [mm]
  rect 0.7x0.25 smd paste+0 mask+0: 1(-1.425,1) 2(-1.425,0.5) 3(-1.425,0) 4(-1.425,-0.5) 5(-1.425,-1) 6(1.425,-1) 7(1.425,-0.5) 8(1.425,0) 9(1.425,0.5) 10(1.425,1)
  rect 1.65x2.38 smd paste+0 mask+0: 11(0,0)
  silkscreen extent -2.42,-1.55 1.55,1.55, body extent -1.88,-1.65 1.88,1.65, height 0.25
FP-R-8-IPC_C [mil]
  rect 73.78x21.34 smd paste+0 mask+0: 1(-91.18,75)
  rrect100% 73.78x21.34 smd paste+0 mask+0: 2(-91.18,25) 3(-91.18,-25) 4(-91.18,-75) 5(91.18,-75) 6(91.18,-25) 7(91.18,25) 8(91.18,75)
  silkscreen extent -163,-96 35,96, body extent -132,-100 132,100, height 10
FP-RN73R1J-MFG [mm]
  rect 0.5x0.6 smd paste+0 mask+0: 1(-0.75,0) 2(0.75,0)
  silkscreen extent -0.9,-0.72 0.9,0.72, body extent -1.1,-0.55 1.1,0.55, height 0.25
FP-RN73R2B-MFG [mm]
  rect 0.9x1.4 smd paste+0 mask+0: 1(-1.55,0) 2(1.55,0)
  silkscreen extent -0.72,-0.9 0.72,0.9, body extent -2.1,-1 2.1,1, height 0.25
FP-RT0603-0_55-MFG [mm]
  rect 0.9x0.8 smd paste+0 mask+0: 1(-0.85,0) 2(0.85,0)
  silkscreen extent -0.85,-0.81 0.86,0.8, body extent -1.4,-0.55 1.4,0.55, height 0.25
FP-RT0603-MFG [mm]
  rect 0.9x0.8 smd paste+0 mask+0: 1(-0.85,0) 2(0.85,0)
  silkscreen extent -0.85,-0.81 0.86,0.8, body extent -1.4,-0.55 1.4,0.55, height 0.25
FP-RT1206-0_65-MFG [mm]
  rect 1x1.5 smd paste+0 mask+0: 1(-1.6,0) 2(1.6,0)
  silkscreen extent -0.72,-0.85 0.72,0.85, body extent -2.2,-0.95 2.2,0.95, height 0.25
KSTN-5012_V [mm] "Test Point, Dia 3.17mm"
  round 2.1 hole 1.6: 1(0,0)
  silkscreen extent -1.59,-1.58 1.59,1.58, body extent -1.59,-1.59 1.59,1.59, height 8.13
LT-MSE-16-EDP_L [mm] "SOP, 16-Leads, Body 4.1x3.1mm, Pitch 0.5mm, Thermal Pad 2.95x1.76mm, IPC High Density"
  oval 1.4x0.25 smd mask+0.051: 1(-2.05,1.75) 2(-2.05,1.25) 3(-2.05,0.75) 4(-2.05,0.25) 5(-2.05,-0.25) 6(-2.05,-0.75) 7(-2.05,-1.25) 8(-2.05,-1.75) 9(2.05,-1.75) 10(2.05,-1.25) 11(2.05,-0.75) 12(2.05,-0.25) 13(2.05,0.25) 14(2.05,0.75) 15(2.05,1.25) 16(2.05,1.75)
  rect 1.76x2.95 smd: 17(0,0)
  silkscreen extent -2.18,-2.08 0.95,2.55, body extent -1.55,-2.05 1.55,2.05, height 1.1
LT-S8-8_N [mm] "SOIC, 8-Leads, Body 4.9x3.9mm, Pitch 1.27mm, IPC Medium Density"
  oval 2.2x0.6 smd: 1(-2.4,1.905) 2(-2.4,0.635) 3(-2.4,-0.635) 4(-2.4,-1.905) 5(2.4,-1.905) 6(2.4,-0.635) 7(2.4,0.635) 8(2.4,1.905)
  silkscreen extent -2.52,-2.5 0.9,2.88, body extent -2,-2.5 2,2.5, height 1.76
RESC1005X40X25ML05T05 [mm] "Chip Resistor, 2-Leads, Body 1.05x0.55mm, IPC Low Density"
  rect 0.65x0.65 smd: 1(-0.5,0) 2(0.5,0)
  body extent -0.53,-0.28 0.53,0.28, height 0.4
RESC1005X40X25NL05T05 [mm] "Chip Resistor, 2-Leads, Body 1.05x0.55mm, IPC Medium Density"
  rect 0.55x0.55 smd: 1(-0.45,0) 2(0.45,0)
  body extent -0.53,-0.28 0.53,0.28, height 0.4
RESC1608X55X25ML10T15 [mm] "Chip Resistor, 2-Leads, Body 1.60x0.80mm, IPC Low Density"
  rect 0.8x1 smd: 1(-0.75,0) 2(0.75,0)
  body extent -0.85,-0.45 0.85,0.45, height 0.55
RESC1608X55X30LL15T15 [mm] "Chip Resistor, 2-Leads, Body 1.60x0.80mm, IPC High Density"
  rect 0.7x0.85 smd: 1(-0.625,0) 2(0.625,0)
  body extent -0.87,-0.48 0.87,0.48, height 0.55
RESC2013X70X40LL20T20 [mm] "Chip Resistor, 2-Leads, Body 2.00x1.25mm, IPC High Density"
  rect 0.95x1.35 smd: 1(-0.775,0) 2(0.775,0)
  body extent -1.1,-0.72 1.1,0.72, height 0.7
RESC2013X70X40NL20T20 [mm] "Chip Resistor, 2-Leads, Body 2.00x1.25mm, IPC Medium Density"
  rect 1.15x1.45 smd: 1(-0.875,0) 2(0.875,0)
  body extent -1.1,-0.72 1.1,0.72, height 0.7
RESC3216X60X45ML10T20 [mm] "Chip Resistor, 2-Leads, Body 3.20x1.60mm, IPC Low Density"
  rect 1.3x1.8 smd: 1(-1.55,0) 2(1.55,0)
  silkscreen extent -0.5,-0.8 0.5,0.8, body extent -1.65,-0.85 1.65,0.85, height 0.6
RESC3216X70X50ML20T25 [mm] "Chip Resistor, 2-Leads, Body 3.20x1.60mm, IPC Low Density"
  rect 1.5x1.9 smd: 1(-1.5,0) 2(1.5,0)
  silkscreen extent -0.35,-0.85 0.35,0.85, body extent -1.7,-0.9 1.7,0.9, height 0.7
RESC3225X70X50ML20T20 [mm] "Chip Resistor, 2-Leads, Body 3.20x2.50mm, IPC Low Density"
  rect 1.45x2.8 smd: 1(-1.525,0) 2(1.525,0)
  silkscreen extent -0.4,-1.3 0.4,1.3, body extent -1.7,-1.35 1.7,1.35, height 0.7

## Part data
C1: library part CMP-2000-06209-2, "CAP ALUM 22UF 20% 50V SMD", Capacitance=22uF, Case/Package=Radial, Dielectric Material=Aluminium, ESR (Equivalent Series Resistance)=880mR, Leakage Current=3uA, Max Operating Temperature=105°C, Min Operating Temperature=-55°C, Package Quantity=1000, Ripple Current=165mA, Tolerance=20%, Voltage=50V, Construction=Cylindrical, Contact Plating=Tin, Diameter=6.3mm, Height=5.8mm, Height - Seated (Max)=0.24inch, Impedance=880mR, Lead Free="Lead Free", Length=5.8mm, Life (Hours)=2000Hour, Mount="Surface Mount", Number of Pins=2, Packaging="Tape and Reel", Polarity=Polar, Radiation Hardening=No, REACH SVHC="No SVHC", Ripple Current (AC)=165mA, RoHS Compliant=Yes, Series=FK, Termination=SMD/SMT, Voltage Rating=50V, Voltage Rating (DC)=50V, Width=7.8mm
C2 C4: library part CMP-08246-003663-1, "Multilayer Ceramic Capacitors 4.7uF ±10% 35V X7R SMD 1206", Capacitance=4.7uF, Case Code (Imperial)=1206, Case Code (Metric)=3216, Dielectric=X7R, Dielectric Material=Ceramic, Max Operating Temperature=125°C, Min Operating Temperature=-55°C, Package Quantity=1, Tolerance=10%, Voltage Rating=35V, Case/Package=1206, Construction=Flat, Depth=1.6mm, Height=1.6mm, Lead Free="Lead Free", Length=3.2mm, Mount="Surface Mount", Packaging="Tape and Reel", RoHS Compliant=Yes, Series=C, Termination=SMD/SMT, Thickness=0.075inch, Voltage Rating (DC)=35V, Weight=0.000571oz, Width=0.063inch
C3: library part CMP-06035-003589-1, "Chip Multilayer Ceramic Capacitors for General Purpose, 1206, 10uF, X7R, 15%, 10%, 25V", Capacitance=10uF, Case Code (Imperial)=1206, Case Code (Metric)=3216, Dielectric=X7R, Max Operating Temperature=125°C, Min Operating Temperature=-55°C, Package Quantity=1, Tolerance=10%, Voltage=25V, Case/Package=1206, Depth=1.6mm, Height=1.6mm, Lead Free="Lead Free", Length=3.2mm, Material=Ceramic, Mount="Surface Mount", Number of Pins=2, Packaging="Tape and Reel", Radiation Hardening=No, REACH SVHC="No SVHC", Termination=SMD/SMT, Thickness=0.071inch, Voltage Rating=25V, Voltage Rating (DC)=25V, Width=1.6mm
C5 C6 C7: library part CMP-13271-004127-1, "Cap Ceramic 1uF 25V X5R ±10% Pad SMD 0603 +85°C T/R", Case Code (Imperial)=0603, Case Code (Metric)=1608, Dielectric=X5R, Max Operating Temperature=85°C, Min Operating Temperature=-55°C, Package Quantity=1, Tolerance=10%, Voltage=25V, Capacitance=1uF, Case/Package=0603, Contact Plating=Tin, Depth=0.8mm, Height=0.8mm, Lead Free="Lead Free", Length=1.6mm, Material=Ceramic, Mount="Surface Mount", Packaging="Tape and Reel", Radiation Hardening=No, Thickness=0.035inch, Voltage Rating=25V, Voltage Rating (DC)=25V, Width=0.031inch
C8 C9 C10 C11 C12: library part CMP-13271-004127-1, "Cap Ceramic 1uF 25V X5R ±10% Pad SMD 0603 +85°C T/R", Capacitance=1uF, Case Code (Imperial)=0603, Case Code (Metric)=1608, Dielectric=X5R, Max Operating Temperature=85°C, Min Operating Temperature=-55°C, Package Quantity=1, Tolerance=10%, Voltage=25V, Case/Package=0603, Contact Plating=Tin, Depth=0.8mm, Height=0.8mm, Lead Free="Lead Free", Length=1.6mm, Material=Ceramic, Mount="Surface Mount", Packaging="Tape and Reel", Radiation Hardening=No, Thickness=0.035inch, Voltage Rating=25V, Voltage Rating (DC)=25V, Width=0.031inch
C13 C14 C16 C17 C19 C20 C22 C23: library part CMP-2007-03453-2, "Chip Multilayer Ceramic Capacitors for General Purpose, 0805, 10uF, X5R, 15%, 10%, 16V", Case Code (Imperial)=0805, Case Code (Metric)=2012, Dielectric=X5R, Max Operating Temperature=85°C, Min Operating Temperature=-55°C, Package Quantity=1, Tolerance=10%, Voltage=16V, Capacitance=10uF, Case/Package=0805, Depth=1.25mm, Height=1.25mm, Lead Free="Lead Free", Length=2mm, Material=Ceramic, Mount="Surface Mount", Packaging="Tape and Reel", Radiation Hardening=No, REACH SVHC="No SVHC", Termination=SMD/SMT, Thickness=0.053inch, Voltage Rating=16V, Voltage Rating (DC)=16V, Width=1.25mm
C15 C18 C21 C24: library part CMP-1037-02920-2, "CAP CER 3000PF 50V NP0 1206", Capacitance="3,000 pF", Manufacturer=KEMET, Manufacturer Part Number=C1206C302J5GACTU, Package=C1206C-EB, Temperature="-55°C to +150°C", Temperature Characteristic=C0G, Temperature Coefficient=15%, Temperature Range High=+150°C, Temperature Range Low=-55°C, Tolerance=0.05, Voltage Rating="50 V", Automotive=Yes, Automotive Grade="Grade 0", Category=Cap, ComponentLink2Description=Datasheet, ComponentLink2URL=https://content.kemet.com/datasheets/KEM_C1007_X8R_ULTRA_150C_SMD.pdf, Device Class L1="Passive Components", Device Class L2=Capacitors, Device Class L3="Ceramic Capacitors", Digikey Description="CAP CER 3000PF 50V NP0 1206", Height=0.88mm, Ipc Land Pattern Name=CAPC320160X78, Lead Free=Yes, Material=Ceramic, Mouser Description="Capacitor, Ceramic, 3Nf, 50Vdc, 5-% Tol, 5+% Tol, C0g-Tc Code, -30, 30Ppm-Tc Rohs Compliant: Yes", Octopart=https://octopart.com/c1206c302j5gactu-kemet-12776246, RoHS=TRUE
C25 C26 C27 C28 C32 C33 C34 C35 C39 C40 C41 C42 C46 C47 C48 C49: library part CMP-1038-02235-2, "CAP CER 10UF 35V X5R 1210", Case Code (Imperial)=1210, Case Code (Metric)=3225, Dielectric=X5R, Dielectric Material=Ceramic, Max Operating Temperature=85°C, Min Operating Temperature=-55°C, Package Quantity=2000, Tolerance=20%, Voltage=35V, Capacitance=10uF, Case/Package=1210, Construction=Flat, Depth=2.5mm, Dissipation Factor=2.5%, Height=1.9mm, Length=3.2mm, Mount="Surface Mount", Packaging="Tape and Reel", Radiation Hardening=No, REACH SVHC="No SVHC", Series=C, Termination=SMD/SMT, Thickness=0.083inch, Voltage Rating=35V, Voltage Rating (DC)=35V, Width=2.5mm
C29 C36 C43 C50: library part CMP-2000-06370-2, "Chip Multilayer Ceramic Capacitors for General Purpose, 2220, 1.0uF, X7R, 15%, 10%, 250V", Case Code (Imperial)=2220, Case Code (Metric)=5750, Dielectric=X7R, Max Operating Temperature=125°C, Min Operating Temperature=-55°C, Package Quantity=1, Tolerance=10%, Voltage=250V, Capacitance=1uF, Case/Package=2220, Depth=5mm, Height=2mm, Lead Free="Lead Free", Length=5.7mm, Material=Ceramic, Mount="Surface Mount", Number of Pins=2, Packaging="Tape and Reel", REACH SVHC="No SVHC", Termination=SMD/SMT, Thickness=0.087inch, Voltage Rating=250V, Voltage Rating (DC)=250V, Width=5mm
C30 C31 C37 C38 C44 C45 C51 C52: library part CMP-2007-03708-1, Manufacturer=Kemet, Part Number=C0805F103K5RACTU
J1: library part CMP-09399-000017-1, "TERM BLOCK HDR 2POS 90DEG 5.08MM", Color=Green, Current=12A, Flammability Rating="UL94 V-0", Package Quantity=50, Voltage=300V, Voltage Rating=250V, Approvals=CSA, Connector Type=Plug, Contact Material=Tin, Contact Plating=Tin, Current Rating=12A, Depth=12mm, Height=12.1mm, Housing Color=Green, Housing Material=Polybutylene, Lead Free="Lead Free", Length=20.32mm, Max Current Rating=12A, Mount="Through Hole", Number of Contacts=2, Number of Levels=1, Number of Poles=2, Number of Positions=2, Number of Positions Per Level=2, Number of Rows=1, Orientation="Right Angle", Packaging=Bulk, Pitch=5.08mm, RoHS Compliant=Yes, Series=MSTB, Termination=Solder, Weight=5.396916oz, Width=20.32mm
J2 J3 J4 J5: library part CMP-03790-39547162-1, "5413194-2 RF BNC Connector, 1 Contact(s), Female, Panel Mount, Solder Terminal, Locking, Jack", Color=Black, Dielectric Material=Polymethylpentene, Frequency=2GHz, Insulation Resistance=5GΩ, Manufacturer Lifecycle Status=ACTIVE, Max Operating Temperature=85°C, Min Operating Temperature=-55°C, Voltage Rating=500V, Body Material=Zinc, Body Plating=Nickel, Connector Type=BNC, Contact Gender=Female, Contact Material=Copper, Contact Plating=Gold, Depth=34.93mm, ELV=Compliant, Fastening Type=Bayonet, Gender=Female, Height=13.18mm, Housing Color=Black, Impedance=75Ω, Insulation Material=Polymethylpentene, Lead Free="Lead Free", Length=14.76mm, Lifecycle Status=Production, Max Frequency=2GHz, Mount="Panel, Through Hole", NexarPartId=39547162, Number of Contacts=1, Number of Positions=1, Orientation="Right Angle", Outside Diameter=14.529mm, Packaging=Bulk, PCB Mounting Orientation="Right Angle", Polarity="Normal, Standard", Radiation Hardening=No, REACH SVHC=Unknown, RoHS=Compliant, Sealable=No, Tail Length=4.11mm, Termination="Solder, Through Hole"
J6 J7 J8 J9 J10 J11 J12 J13 J14 J15 J16 J17 J18 J19 J20 J21 J22 J23 J24 J25 J26 J27 J28 J29 J30 J31 J32 J33 J34 J35 J36 J37 J38 J39 J40 J41 J42: library part CMP-2000-05181-2, "PC TEST POINT MINIATURE BLACK", Color=Black, Flammability Rating="UL94 V-0", Package Quantity=100, Body Material=Bronze, Contact Material=Bronze, Contact Plating=Silver, Diameter=2.54mm, Height=0.3inch, Hole Diameter=1.6mm, Housing Color=Black, Inside Diameter=1.27mm, Insulation=Insulated, Insulation Material=Nylon, Lead Free="Lead Free", Length=7.62mm, Material=Nylon, Mount="Through Hole", Number of Contacts=1, Number of Ports=1, Orientation=Straight, Outside Diameter=2.54mm, Packaging=Bulk, Plating=Silver, REACH SVHC="No SVHC", RoHS Compliant=Yes, Series=THM, Termination="Through Hole"
MP1 MP2 MP3 MP4: library part CMP-46196-000003-1, "HEX STANDOFF #4-40 ALUM 7/16\"", Case/Package=Aluminum, Body Length=0.437inch, Gender="Female, Female", Material=Aluminium, Series=-, Size=0.187inch, Thread Size=#4-40, Threaded/Unthreaded=Threaded
Q1 Q2 Q3 Q4 Q5: library part CMP-1058-00769-2, "MOSFET N-CH 60V 260MA SOT-23", Case/Package=SOT-23-3, Continuous Drain Current (ID)=260mA, Drain to Source Breakdown Voltage=60V, Drain to Source Resistance=2.5R, Gate to Source Voltage (Vgs)=20V, Input Capacitance=26.7pF, Max Operating Temperature=150°C, Max Power Dissipation=300mW, Min Operating Temperature=-55°C, Package Quantity=3000, Threshold Voltage=1V, Element Configuration=Single, Fall Time=1.2ns, Halogen Free="Halogen Free", Height=0.94mm, Lead Free="Lead Free", Length=2.9mm, Nominal Vgs=1V, Number of Elements=1, Number of Pins=3, On-State Resistance=2.5R, Packaging="Tape and Reel", Power Dissipation=300mW, Radiation Hardening=No, Rds On Max=2.5R, REACH SVHC="No SVHC", Rise Time=1.2ns, Turn-Off Delay Time=4.8ns, Turn-On Delay Time=1.7ns, Width=1.3mm
R1: library part CMP-1011-00768-4, "Chip Resistor, 200 KOhm, +/- 1%, 100 mW, -55 to 155 degC, 0402 (1005 Metric), RoHS, Tape and Reel", Case Code (Imperial)=0402, Case Code (Metric)=1005, Manufacturer="Basic Passives", Max Operating Temperature="155 degC", Min Operating Temperature="-55 degC", Package Quantity=10000, PartNumber=ERJ-2RKF2003X, Power Rating="100 mW", Resistance="200 KOhm", Tolerance=1%, Voltage Rating="50 V", Case\/Package=0402, ComponentLink1Description="Manufacturer URL", ComponentLink1URL=http://www.panasonic.com/, ComponentLink2Description=Datasheet, ComponentLink2URL=http://industrial.panasonic.com/cdbs/www-data/pdf/RDA0000/AOA0000C86.pdf, DatasheetVersion=04/2015, Height="0.35 mm", Length="1 mm", Mount="Surface Mount", Mounting Technology="Surface Mount", PackageDescription="2-Pin Surface Mount Device, Body 1 x 0.5 mm", PackageReference=0402, Packaging="Tape and Reel", Pins=2, Radiation Hardening=No, REACH SVHC="No SVHC", RoHSCompliant=true, Width="0.5 mm"
R2: library part CMP-1665-00002-5, "Chip Resistor, 0 Ohm, +/- 1%, 0.125 W, -55 to 155 degC, 0805 (2012 Metric), RoHS, Tape and Reel", Case Code (Imperial)=0805, Case Code (Metric)=2012, Max Operating Temperature="155 degC", Min Operating Temperature="-55 degC", Package Quantity=5000, PartNumber=ERJ-6GEY0R00V, Resistance="0 Ohm", Tolerance=5%, Case/Package=0805, ComponentLink1Description="Manufacturer URL", ComponentLink1URL=http://www.panasonic.com/, ComponentLink2Description=Datasheet, ComponentLink2URL=http://industrial.panasonic.com/cdbs/www-data/pdf/RDA0000/AOA0000C84.pdf, DatasheetVersion=03/2015, Height="0.6 mm", Length="2 mm", Mounting Technology="Surface Mount", PackageDescription="2-Pin Surface Mount Device, Body 2 x 1.25 mm", Packaging="Tape and Reel", Radiation Hardening=No, REACH SVHC="No SVHC", RoHSCompliant=True, Width="1.25 mm"
R3: library part CMP-2001-00194-1, Manufacturer=Panasonic, Part Number=ERJ-6ENF4533V
R4: library part CMP-2001-00071-1, Manufacturer=Panasonic, Part Number=ERJ-6ENF2490V
R5: library part CMP-2002-00646-4, "Chip Resistor, 12 KOhm, +/- 1%, 0.1 W, -55 to 155 degC, 0402 (1005 Metric), RoHS, Tape and Reel", Case Code (Imperial)=0402, Case Code (Metric)=1005, Max Operating Temperature="155 degC", Min Operating Temperature="-55 degC", Package Quantity=10000, PartNumber=ERJ-2RKF1202X, Power Rating="100 mW", Resistance="12 KOhm", Tolerance=1%, Voltage Rating="50 V", Case\/Package=0402, ComponentLink1Description="Manufacturer URL", ComponentLink1URL=http://www.panasonic.com/, ComponentLink2Description=Datasheet, ComponentLink2URL=http://industrial.panasonic.com/cdbs/www-data/pdf/RDA0000/AOA0000C86.pdf, DatasheetVersion=04/2015, Height="0.35 mm", Length="1 mm", Mount="Surface Mount", Mounting Technology="Surface Mount", PackageDescription="2-Pin Surface Mount Device, Body 1 x 0.5 mm", PackageReference=0402, Packaging="Tape and Reel", Pins=2, REACH SVHC=Yes, RoHSCompliant=true, Width="0.5 mm"
R6: library part CMP-2000-00221-1, Manufacturer=Panasonic, Part Number=ERJ-3EKF1213V
R7 R9 R11 R13 R14: library part CMP-00621-34935746-1, "RT0603BRD0732KL High Precision-High Stability Chip Resistor Thin Film 0603 32kOhm 0.1% Paper T/R", Case/Package=0603, Max Operating Temperature=155°C, Max Power Dissipation=100mW, Min Operating Temperature=-55°C, Resistance=32kΩ, Temperature Coefficient=25ppm/°C, Tolerance=0.1%, Composition="Thin Film", Features="Moisture Resistant", Height=558.8µm, Length=1.6002mm, NexarPartId=34935746, Number of Terminations=2, Packaging="Tape & Reel", RoHS=Compliant, Width=787.4µm
R8 R10 R15: library part CMP-04015-006526-1, "597Ω ±0.1% 0.25W, 1/4W Chip Resistor 1206 (3216 Metric) Moisture Resistant Thin Film"
R12: library part CMP-2005-03919-1, Manufacturer=Panasonic, Part Number=ERJP14F3000U
R16 R17 R18: library part CMP-04015-068438-1, "41.7kΩ ±1% 0.1W, 1/10W Chip Resistor 0603 (1608 Metric) Moisture Resistant Thin Film"
R19 R20 R21: library part CMP-2000-04454-1, Manufacturer=Yageo, Part Number=RT0603BRD073KL
R22 R23 R24 R25 R26: library part CMP-00621-71394448-1, "RT0603BRE078KL SMD Chip Resistor, 8 kOhm, ± 0.1%, 100 mW, 0603 [1608 Metric], Thin Film, High Precision High Stability", Case/Package=0603, Max Operating Temperature=155°C, Max Power Dissipation=100mW, Min Operating Temperature=-55°C, Resistance=8kΩ, Temperature Coefficient=50ppm/°C, Tolerance=0.1%, Voltage Rating=75V, Composition="Thin Film", Features="Moisture Resistant", Height=550µm, Length=1.6002mm, NexarPartId=71394448, Number of Terminations=2, Packaging="Tape & Reel", Power Rating=100mW, RoHS=Compliant, Width=787.4µm
R27 R28 R29 R30 R31 R37 R46 R55 R64: library part CMP-2000-00870-2, "RES SMD 100 OHM 0.1% 1/10W 0603", Case Code (Imperial)=0603, Case Code (Metric)=1608, Max Operating Temperature=155°C, Max Power Dissipation=100mW, Min Operating Temperature=-55°C, Package Quantity=5000, Resistance=100R, Resistance Tolerance=0.1%, Resistor Type="Thin Film", Temperature Coefficient=25ppm/°C, Voltage Rating=75V, Case/Package=0603, Construction=Rectangular, Contact Plating=Tin, Depth=0.8mm, Height=0.45mm, Length=1.6mm, Military Standard=Not, Mount="Surface Mount", Number of Pins=2, Number of Terminations=2, Packaging="Tape and Reel", Power Rating=100mW, Radiation Hardening=No, REACH SVHC="No SVHC", RoHS Compliant=Yes, Series=ERA-3A, Size Code=0603, Technology="METAL FILM", Termination=SMD/SMT, Tolerance=0.1%, Width=0.8mm
R32 R33 R34 R36 R41 R42 R43 R45 R50 R51 R52 R54 R59 R60 R61 R62: library part CMP-2003-04406-1, Manufacturer=Panasonic, Part Number=ERA8AEB102V
R35 R44 R53: library part CMP-2000-04347-2, "RES SMD 10 OHM 0.1% 1/10W 0603", Manufacturer=Yageo, Manufacturer Part Number=RT0603BRD0710RL, Package=RT0603, Power Rating=0.1W, Resistance=10Ω, Temperature="-55°C to +155°C", Temperature Coefficient="25 ppm/°C", Temperature Range High=+155°C, Temperature Range Low=-55°C, Tolerance=0.001, Voltage Rating=75V, Automotive=No, Category=Res, ComponentLink2Description=Datasheet, ComponentLink2URL=http://www.yageo.com/documents/recent/PYu-RT_1-to-0.01_RoHS_L_9.pdf, Composition="Thin Film", Device Class L1="Passive Components", Device Class L2=Resistors, Device Class L3="Chip SMD Resistors", Digikey Description="RES SMD 10 OHM 0.1% 1/10W 0603", Footprint Url=http://www.yageo.com/exep/pages/download/literatures/PYu-R_Mount_10.pdf, Height=0.55mm, Ipc Land Pattern Name=RESC16080X45, Lead Free=Yes, Mouser Description="Thin Film Resistors - SMD 1/10W 10 ohm .1% 25ppm", Octopart=https://octopart.com/rt0603brd0710rl-yageo-1216748, RoHS=TRUE, Series=RT
R38 R47 R56 R65: library part CMP-05422-000155-1, "RES SMD 10K OHM 1% 1/3W 0603", RoHS Compliant=Yes
R39 R40 R48 R49 R57 R58 R66 R67: library part CMP-03412-001731-1, "RES SMD 5K OHM 0.1% 1/4W 1206", Manufacturer=Yageo, Manufacturer Part Number=RT1206BRD075KL, Package=RT1206-0.65, Power Rating=0.25W, Resistance=5kΩ, Temperature="-55°C to +155°C", Temperature Coefficient=25ppm/°C, Temperature Range High=+155°C, Temperature Range Low=-55°C, Tolerance=0.1%, Voltage Rating=200V, Automotive=No, Category=Res, ComponentLink2Description=Datasheet, ComponentLink2URL=https://www.yageo.com/upload/media/product/productsearch/datasheet/rchip/PYu-RT_1-to-0.01_RoHS_L_11.pdf, Composition="Thin Film", Device Class L1="Passive Components", Device Class L2=Resistors, Device Class L3="Chip SMD Resistors", Digikey Description="RES SMD 5K OHM 0.1% 1/4W 1206", Footprint Url=https://www.yageo.com/upload/website/yageo_PYu-R_Mount_10_19050818_343.pdf, Height=0.65mm, Ipc Land Pattern Name=RESC310160X55, Lead Free=Yes, Mouser Description="Thin Film Resistors - SMD 1/4W 5K ohm .1% 25ppm", Octopart=https://octopart.com/rt1206brd075kl-yageo-29806230, RoHS=TRUE, Series=RT
R63: library part CMP-2003-01944-1, Manufacturer="Vishay Dale", Part Number=CRCW120620R0FKEA
R68 R69 R73 R74 R78 R79 R83 R84: library part CMP-2003-02425-2, "RES Thick Film, 909kΩ, 1%, 0.25W, 100ppm/°C, 1206", Case Code (Imperial)=1206, Case Code (Metric)=3216, Max Operating Temperature=155°C, Max Power Dissipation=250mW, Min Operating Temperature=-55°C, Package Quantity=10, Resistance=909kR, Temperature Coefficient=100ppm/°C, Tolerance=1%, Voltage Rating=200V, Case/Package=1206, Composition="Thick Film", Contact Plating=Tin, Depth=1.6mm, Features="Automotive AEC-Q200", Height=0.024inch, Lead Free="Lead Free", Length=3.2mm, Military Standard=Not, Number of Terminations=2, Packaging="Tape and Reel", Power Rating=250mW, Radiation Hardening=No, Termination=SMD/SMT, Voltage Rating (DC)=200V, Weight=0.000353oz, Width=1.6mm
R70 R71 R75 R76 R80 R81 R85 R86: library part CMP-2003-04909-2, "RES SMD 100K OHM 1% 1/4W 1206", Manufacturer=Yageo, Manufacturer Part Number=AC1206FR-07100KL, Package=AC1206, Power Rating=0.25W, Resistance=100KΩ, Temperature="-55°C to +155°C", Temperature Range High=+155°C, Temperature Range Low=-55°C, Tolerance=0.01, Voltage Rating=200V, Automotive=Yes, Automotive Grade="Grade 0", Category=Res, ComponentLink2Description=Datasheet, ComponentLink2URL=http://www.yageo.com/NewPortal/yageodocoutput?fileName=/pdf/R-Chip/PYu-AC_51_RoHS_L_6.pdf, Composition="Thick Film", Device Class L1="Passive Components", Device Class L2=Resistors, Device Class L3="Chip SMD Resistors", Digikey Description="RES SMD 100K OHM 1% 1/4W 1206", Footprint Url=http://www.yageo.com/exep/pages/download/literatures/PYu-R_Mount_10.pdf, Height=0.65mm, Ipc Land Pattern Name=RESC310160X55, Lead Free=Yes, Mouser Description="RES SMD 100K OHM 1% 1/4W 1206", Octopart=https://octopart.com/ac1206fr-07100kl-yageo-21711116, RoHS=TRUE, Series=AC
R72 R77 R82 R87: library part CMP-2003-01933-2, "RES Thick Film, 200kΩ, 1%, 0.25W, 100ppm/°C, 1206", Case Code (Imperial)=1206, Case Code (Metric)=3216, Max Operating Temperature=155°C, Max Power Dissipation=250mW, Min Operating Temperature=-55°C, Package Quantity=10, Resistance=200kR, Temperature Coefficient=100ppm/°C, Tolerance=1%, Voltage Rating=200V, Case/Package=1206, Composition="Thick Film", Contact Plating=Tin, Depth=1.6mm, Features="Automotive AEC-Q200", Height=0.55mm, Lead Free="Lead Free", Length=3.2mm, Military Standard=Not, Mount="Surface Mount", Number of Terminations=2, Packaging="Tape and Reel", Power Rating=250mW, Radiation Hardening=No, Termination=SMD/SMT, Voltage Rating (DC)=200V, Weight=0.000353oz, Width=1.6mm, Working Voltage=200V
TP1: library part CMP-1672-00004-4, "Test Point, White, Through Hole, RoHS, Bulk", Colour=White, Manufacturer=Keystone, Package Quantity=100, ComponentLink1Description="Manufacturer URL", ComponentLink1URL=http://www.keyelco.com/, ComponentLink2Description=Datasheet, ComponentLink2URL=http://www.keyelco.com/product-pdf.cfm?p=1321, Contact Material=Bronze, Contact Plating=Silver, DatasheetVersion="Rev. F, 12/2013", Height="8.12 mm", Length="11.3 mm", Mount="Through Hole", Mounting Technology="Through Hole", PackageDescription="1-Pin Through Hole Device, Dia 3.17 mm", PackageReference=5012, Packaging=Bulk, Pins=1, REACH SVHC="No SVHC", RoHSCompliant=true
U1: library part CMP-09138-000240-1, "IC REG LINEAR 0V 500MA 10DFN", Case/Package=DFN, Dropout Voltage=260mV, Max Operating Temperature=125°C, Min Current Limit=570mA, Min Operating Temperature=-40°C, Output Current=500mA, Output Voltage=15V, Number of Regulators=1, RoHS Compliant=Yes, Series=-
U2 U5 U9 U12 U16 U19 U23 U26: library part CMP-0384-00640-2, "Single Channel Wide Bandwidth Operational Amplifier, 1.3 MHz BW, 700 mV/us SR, Industrial, 8-pin SOIC (R-8), Reel", Amplifiers Per Package=1, Input Bias Current=500pA, Input Offset Voltage=15uV, Manufacturer="Analog Devices", PartNumber=OP1177ARZ-REEL7, Code_JEDEC=MS-012-AA, ComponentLink1Description="Manufacturer URL", ComponentLink1URL=http://www.analog.com/en/index.html, ComponentLink2Description=Datasheet, ComponentLink2URL=http://www.analog.com/static/imported-files/data_sheets/OP1177_2177_4177.pdf, ComponentLink3Description="Package Specification", ComponentLink3URL=http://www.analog.com/static/imported-files/packages/PKG_PDF/SOIC_Narrow%20(R)/R_8.pdf, ComponentLink4Description="Reference Circuit", ComponentLink4URL=http://www.analog.com/en/all-operational-amplifiers-op-amps/operational-amplifiers-op-amps/op1177/products/product.html#product-recommendations, DatasheetVersion="Rev. G", Generic Part Number=OP1177, Iq/Amp=500uA, Mounting Technology="Surface Mount", PackageDescription="8-Pin Standard Small Outline Package, Body 3.9 x 4.9 mm, Pitch 1.27 mm", PackageReference=R-8, PackageVersion=060506-A, RevisionNote="Reference Circuit URL fixed", Slew Rate=700mV/us, Small Signal Bandwidth=1.3MHz, V Span Max=36V, V Span Min=5V
U3 U4 U6 U10 U11 U13 U17 U18 U20 U24 U25 U27: library part CMP-0359-02644-2, "Single Channel, Low Noise, High Speed Operational Amplifier, RRIO, 100 MHz Typical GBW, 25 V/us Typical SR, 2.5 to 12.6 V, 8-Pin SOIC (S8-8), Commercial, Pb-Free", Manufacturer="Linear Technology", PartNumber=LT6202CS8#PBF, Channels (#)=1, ComponentLink1Description="Manufacturer URL", ComponentLink1URL=http://www.linear.com/, ComponentLink2Description=Datasheet, ComponentLink2URL=http://cds.linear.com/docs/en/datasheet/620234fd.pdf, ComponentLink3Description="Package Specification", ComponentLink3URL=http://cds.linear.com/docs/en/packaging/05081610_G_SO8.pdf, DatasheetVersion="Rev. D", GBW (MHz) Typical=100, Is (mA) Typical=2.8, Linear Technology Part Number=LT6202, Mounting Technology="Surface Mount", PackageDescription="8-Pin Plastic Small Outline, Body 4.9 x 3.9 mm, Pitch 1.27 mm", PackageReference=LT-S8-8, PackageVersion="Rev G", RevisionNote="URLs updated", RoHS=Pb-Free, SR (V/us) Typical=25, Type=VFB, Vos (mV) Guaranteed=0.5, Vos (mV) Typical=0.1, Vs Max (V)=12.6, Vs Min (V)=2.5
U7 U8 U14 U15 U21 U22 U28 U29: library part CMP-09116-000012-1, "IC OPAMP INSTR 10MHZ 8SOIC", Input Bias Current=0.001uA, Input Offset Voltage=0.07mV, Manufacturer="Analog Devices", Manufacturer Part Number=AD8421ARZ-R7, Max Dual Supply Voltage=18V, Max Junction Temp=+150°C, Max Supply Voltage=36V, Min Dual Supply Voltage=2.5V, Min Supply Voltage=5V, Nominal Supply Current=2mA, Package=R-8, Temperature="-40°C to +85°C", Temperature Range High=+85°C, Temperature Range Low=-40°C, Automotive=No, Bandwidth=10MHz, Category=IC, ComponentLink2Description=Datasheet, ComponentLink2URL=https://www.analog.com/media/en/technical-documentation/data-sheets/AD8421.pdf, Device Class L1="Integrated Circuits (ICs)", Device Class L2="Linear ICs", Device Class L3=Instrumentation, Digikey Description="IC OPAMP INSTR 10MHZ 8SOIC", Height=1.75mm, Lead Free=Yes, Mouser Description="Instrumentation Amplifiers 3nV/Hz Low Power", Number of Channels=1, Octopart=https://octopart.com/ad8421arz-r7-analog+devices-21054779, RoHS=TRUE, Standoff Height=0.1mm
U30 U31 U32 U33: library part CMP-0475-00260-1, "Low Noise Dual Supply Inverting Charge Pump, 4.5 to 32 V Vin, Adjustable Vout, 16-pin SOP (MSE-16-EDP), -40 to 125 degC, Pb-Free, Tape and Reel", Frequency(kHz)=500, Manufacturer="Linear Technology", PartNumber=LTC3260EMSE#TRPBF, ComponentLink1Description="Manufacturer URL", ComponentLink1URL=http://www.linear.com/, ComponentLink2Description=Datasheet, ComponentLink2URL=http://cds.linear.com/docs/en/datasheet/3260fa.pdf, ComponentLink3Description="Package Specification", ComponentLink3URL=http://cds.linear.com/docs/en/packaging/05081667_F_MSE16.pdf, DatasheetVersion="Rev. A", Ishutdown(uA)=2, Isupply(mA)=0.1, Max Iout(mA)=100, Mounting Technology="Surface Mount", PackageDescription="16-Pin Plastic MSOP, Exposed Die Pad, Body 4.039 x 3 mm, Pitch 0.5 mm", PackageReference=MSE-16, PackageVersion="Rev. F, 05/2013", Packing="Tape and Reel", RoHS=TRUE, Vin Max(V)=32, Vin Min(V)=4.5, Voutput=Adj

## Via types
v1: diameter 28, hole 15, Top Layer to Bottom Layer, 195 vias
v2: diameter 50, hole 28, Top Layer to Bottom Layer, 70 vias
v3: diameter 19.68, hole 7.87, Top Layer to Bottom Layer, 24 vias
v4: diameter 30, hole 15, Top Layer to Bottom Layer, 16 vias
v5: diameter 50, hole 25, Top Layer to Bottom Layer, 1 vias

## Nets (pads, with @x,y where several pads share a name; then routed paths per layer and width w, separated by ;. In a path a pad name is that pad's centre, name@x,y a point inside that pad or via, vN(x,y) a via of type N, cw(c..) or ccw(c..) an arc to the next point about the centre after c; other vN are vias at no path point)
+15V: C1.2 C2.1 C26.1 C33.1 C40.1 C47.1 J1.1 J6.1 R1.2 R2.2 U1.1 U1.2 U30.1 U30.11 U30.13 U31.1 U31.11 U31.13 U32.1 U32.11 U32.13 U33.1 U33.11 U33.13 | length 14752
  Top Layer w8.5: C26.1@653,3527.88 685.48,3527.88 717.83,3495.53 U30.11@830.29,3495.53 ; v4(665,3430) 666.23,3430 692.39,3456.16 U30.13@830.29,3456.16 ; U32.1@958.58,1503.11 959.38,1503.11 960,1503.73 v4(960,1580) ; U30.1@991.71,3397.1 995,3393.81 v4(995,3330) ; U32.11@1120,1404.68 1191.34,1404.68 1191.66,1405 1240,1405 1301,1344 C40.1@1301,1247.12 ; U32.13@1120,1444.05 1209.05,1444.05 v4(1240,1475) ; C33.1@1329,4473.88 1361.48,4473.88 1410.83,4424.53 U31.11@1544.29,4424.53 ; v4(1410,4350) 1410,4355.82 1439.34,4385.16 U31.13@1544.29,4385.16 ; v4(1705,4265) 1705,4325.48 1705.62,4326.1 U31.1@1705.71,4326.1 ; U33.1@2068.29,875.9 2069.38,875.9 2070,876.52 v4(2070,935) ; U33.11@2229.71,777.47 2332.53,777.47 2368.07,741.93 2368.07,641.57 2382.52,627.12 C47.1@2415,627.12 ; U33.13@2229.71,816.84 2329.77,816.84 2352.93,840 v4(2360,840)
  Top Layer w10: v2(690,2600) 690,2753.74 J6.1@751.14,2814.88
  Top Layer w20: v2(485,3570) 527.12,3527.88 C26.1@653,3527.88 ; v2@688.95,2599.92 689.03,2600 v2(690,2600) ; v2(1155,4475) 1155.56,4474.44 1328.44,4474.44 C33.1@1329,4473.88 ; C40.1@1301,1247.12 1302.44,1248.56 1513.56,1248.56 v2(1515,1250) ; C47.1@2415,627.12 2416.44,628.56 2638.56,628.56 v2(2640,630)
  Top Layer w40: v2(690,2600) 1078.5,2600 1090,2588.5 C1.2@1090,2583.43
  Top Layer w60: J1.1@475.55,2599.92 v2@688.95,2599.92